# Altium PCB ublox_gnss_node.PcbDoc (part 1 of 5)
Units mm, origin at the board's own origin, x right, y up, seen from the top; angles counter-clockwise.
Board outline 84 x 108.04 mm, 6 copper layers (Top Layer (HSig), L2 GND, L3 Signal X, L4 PWR, L5 GND, Bottom Layer (Y)), stack 1.538 mm thick; 222 components, 159 nets, 892 pads, 1025 vias.
Unrouted connection lines stored in the file: 345.
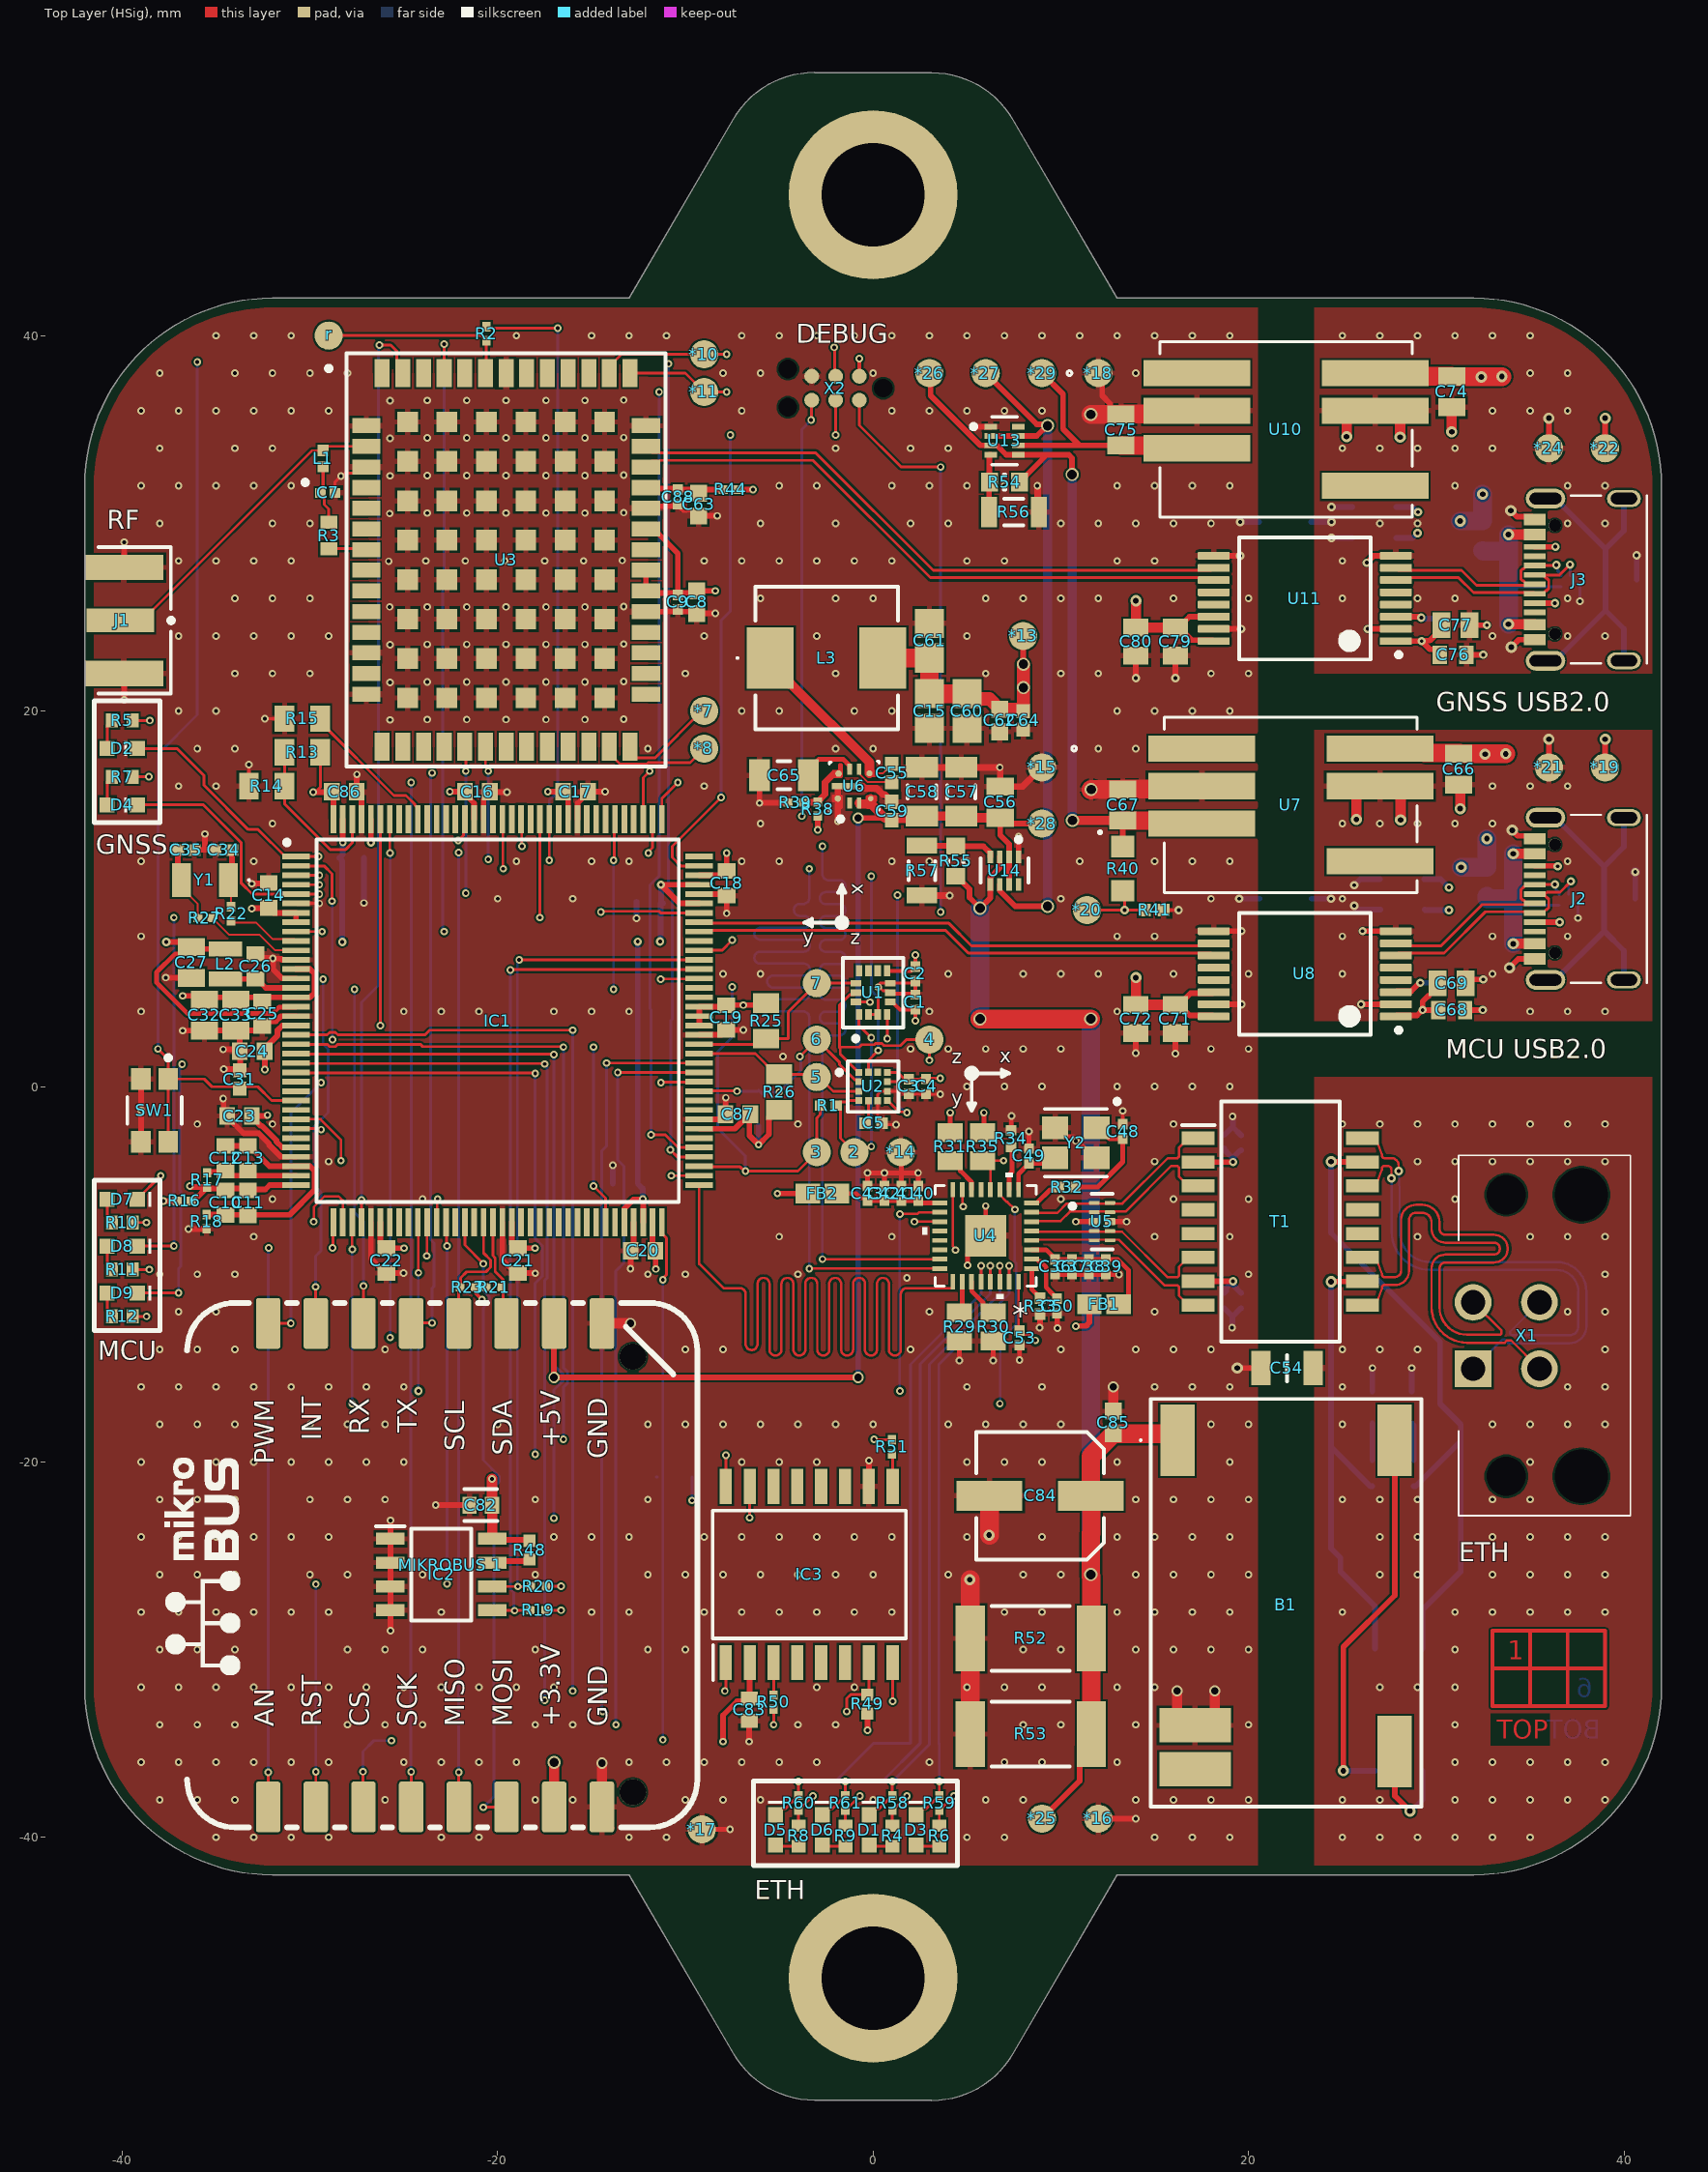
[diagram p0: Top Layer (HSig) view]
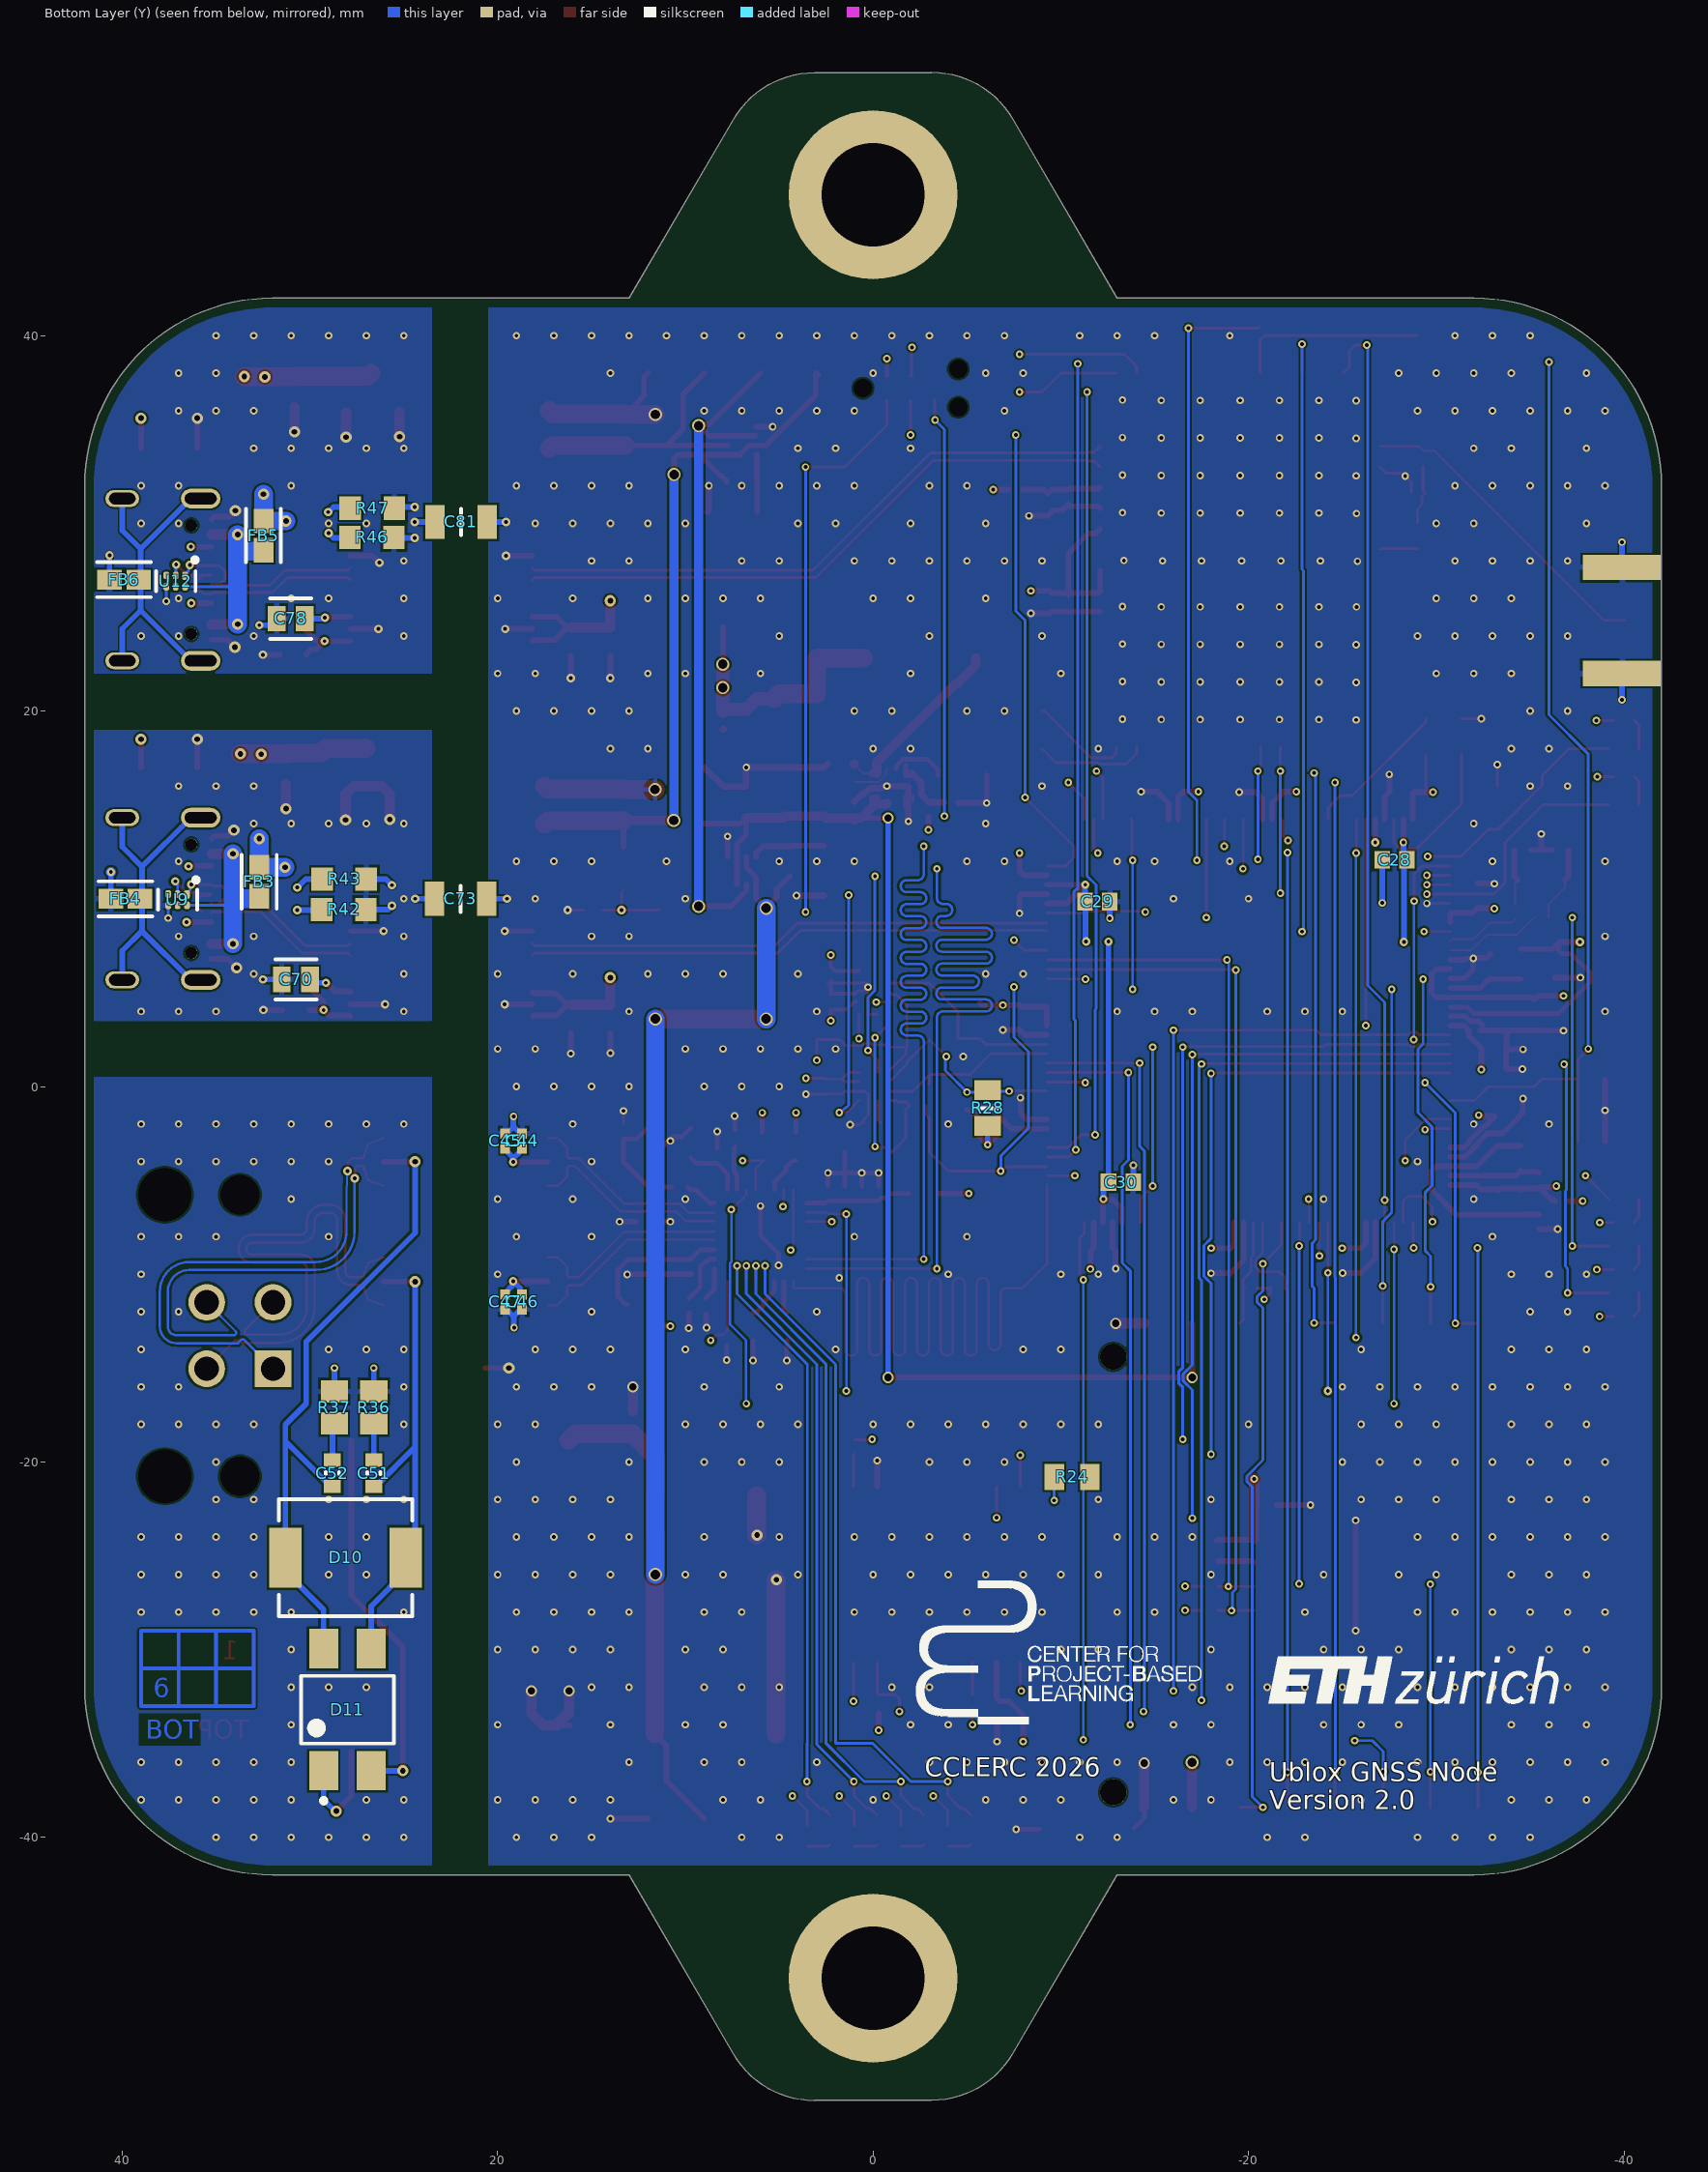
[diagram p1: Bottom Layer (Y) view, seen from below]
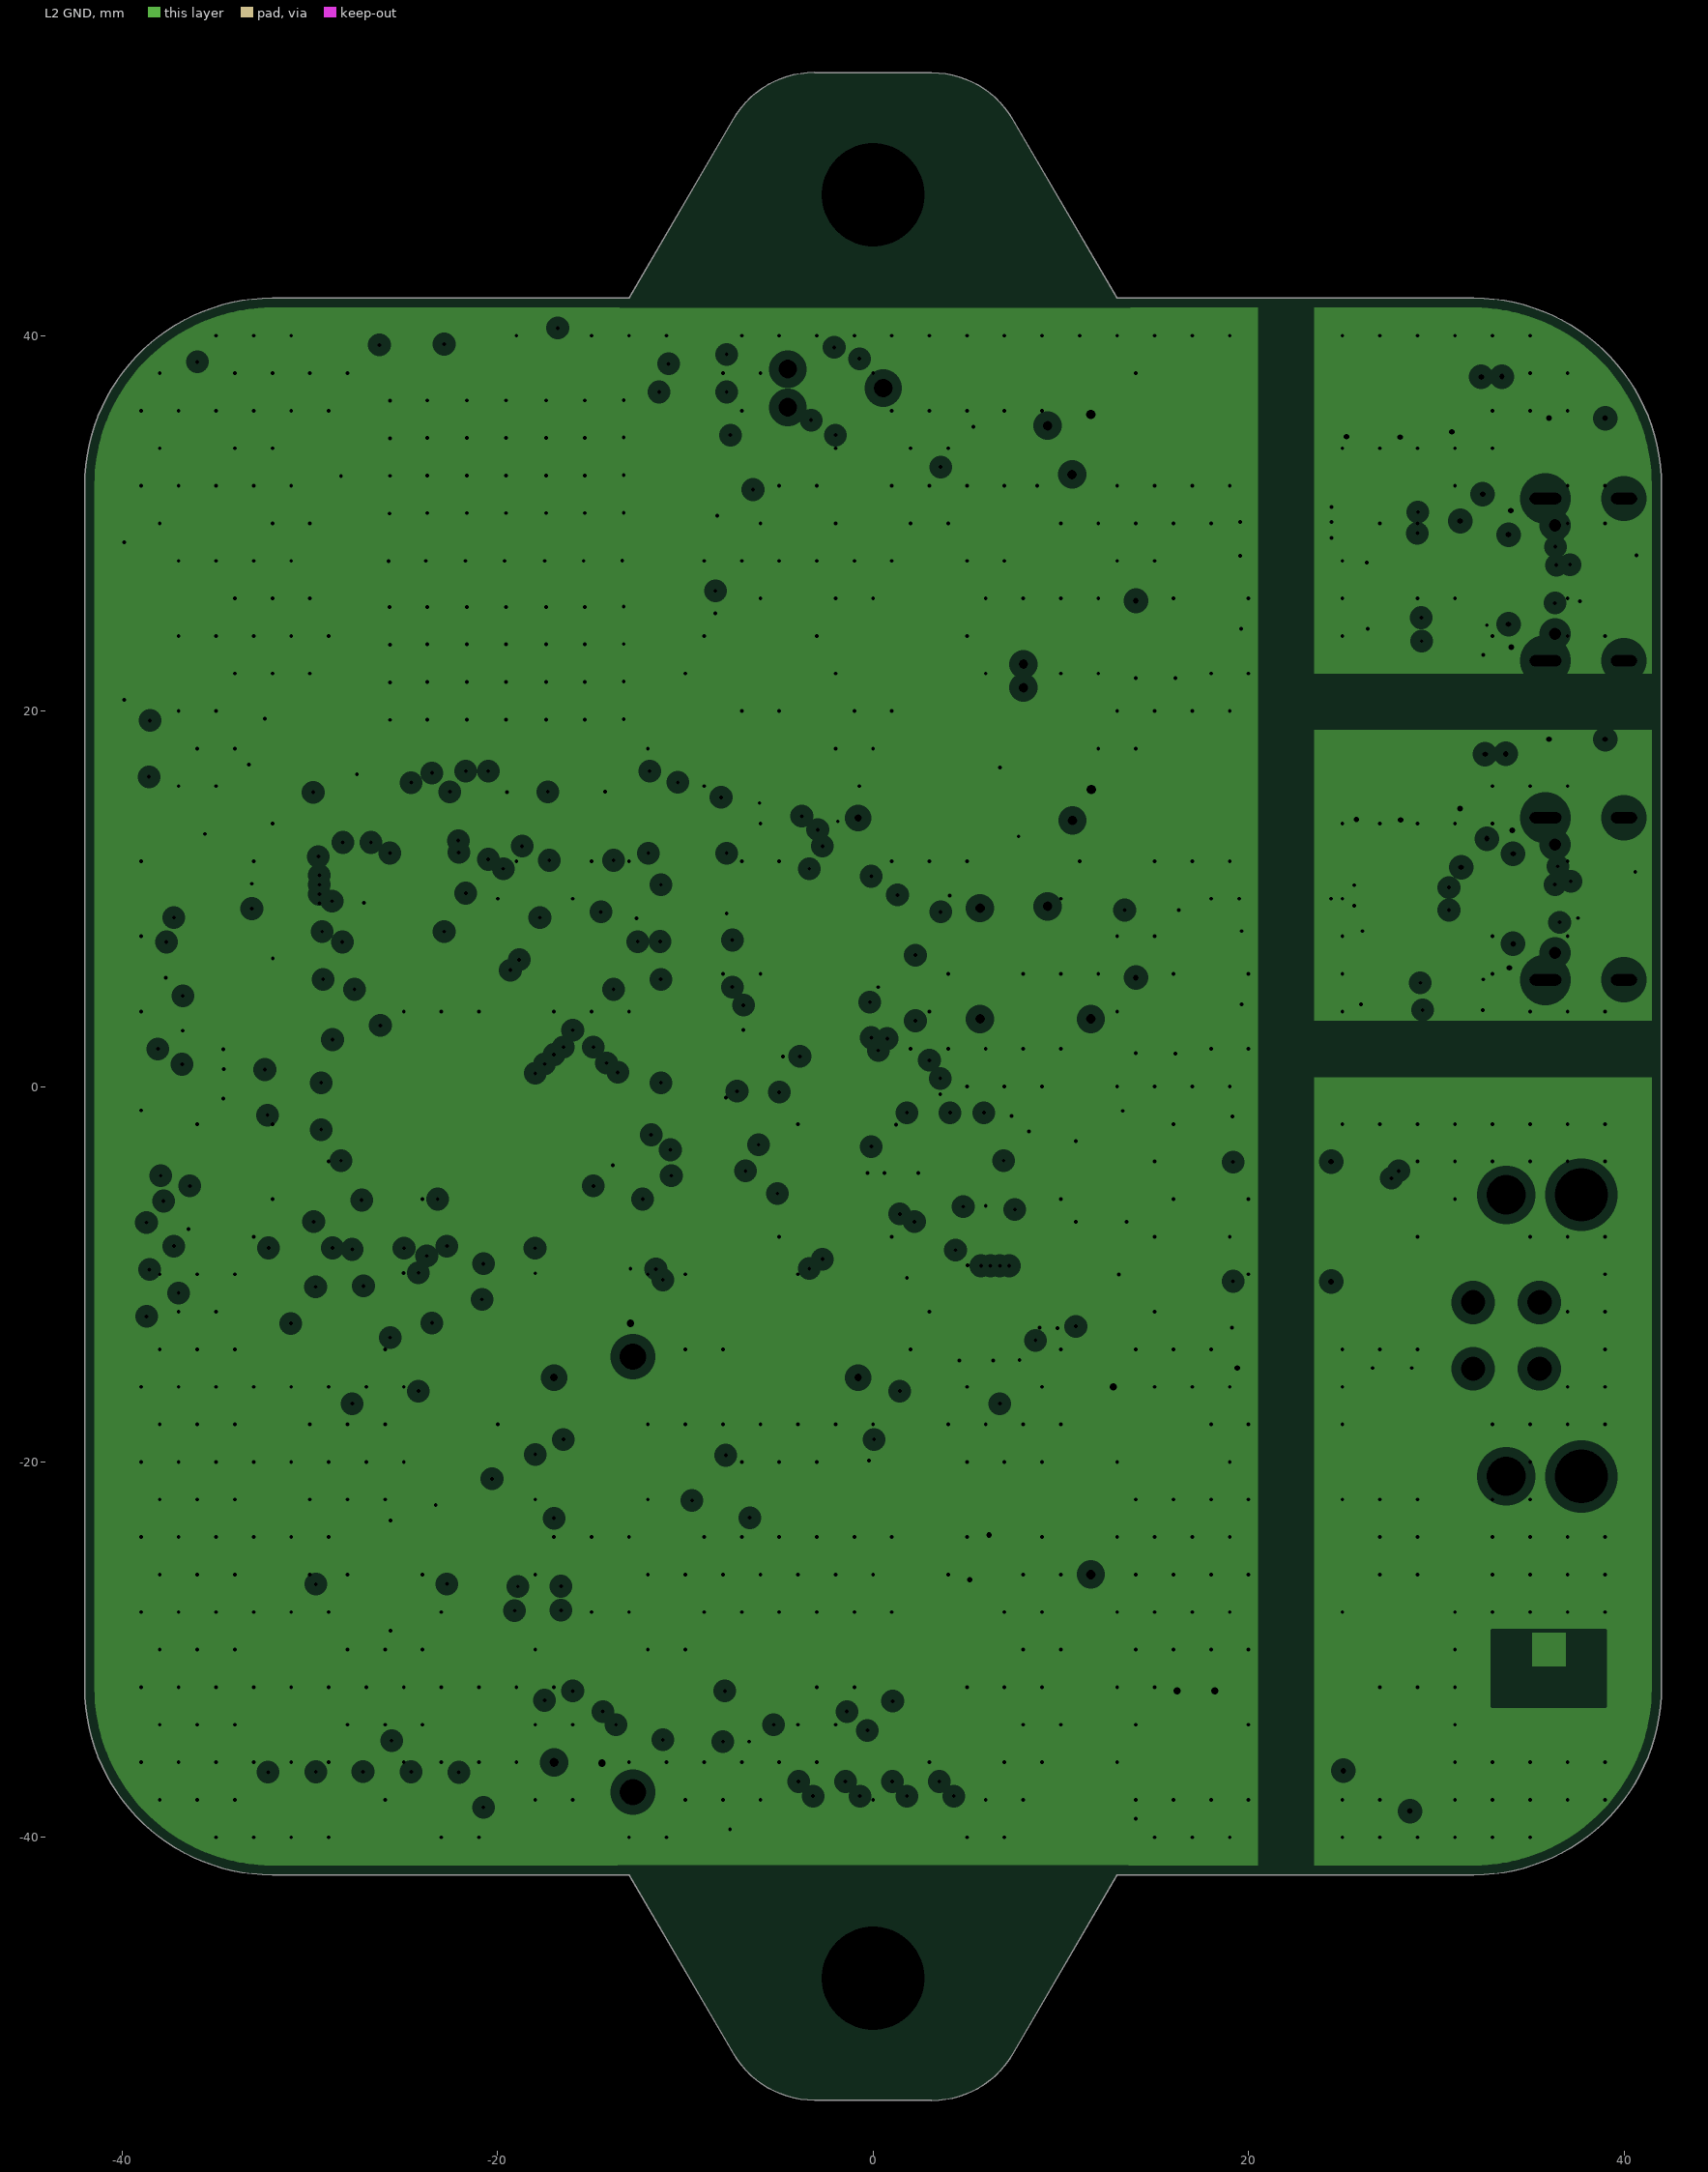
[diagram p2: L2 GND, clearances drawn from the general rule]
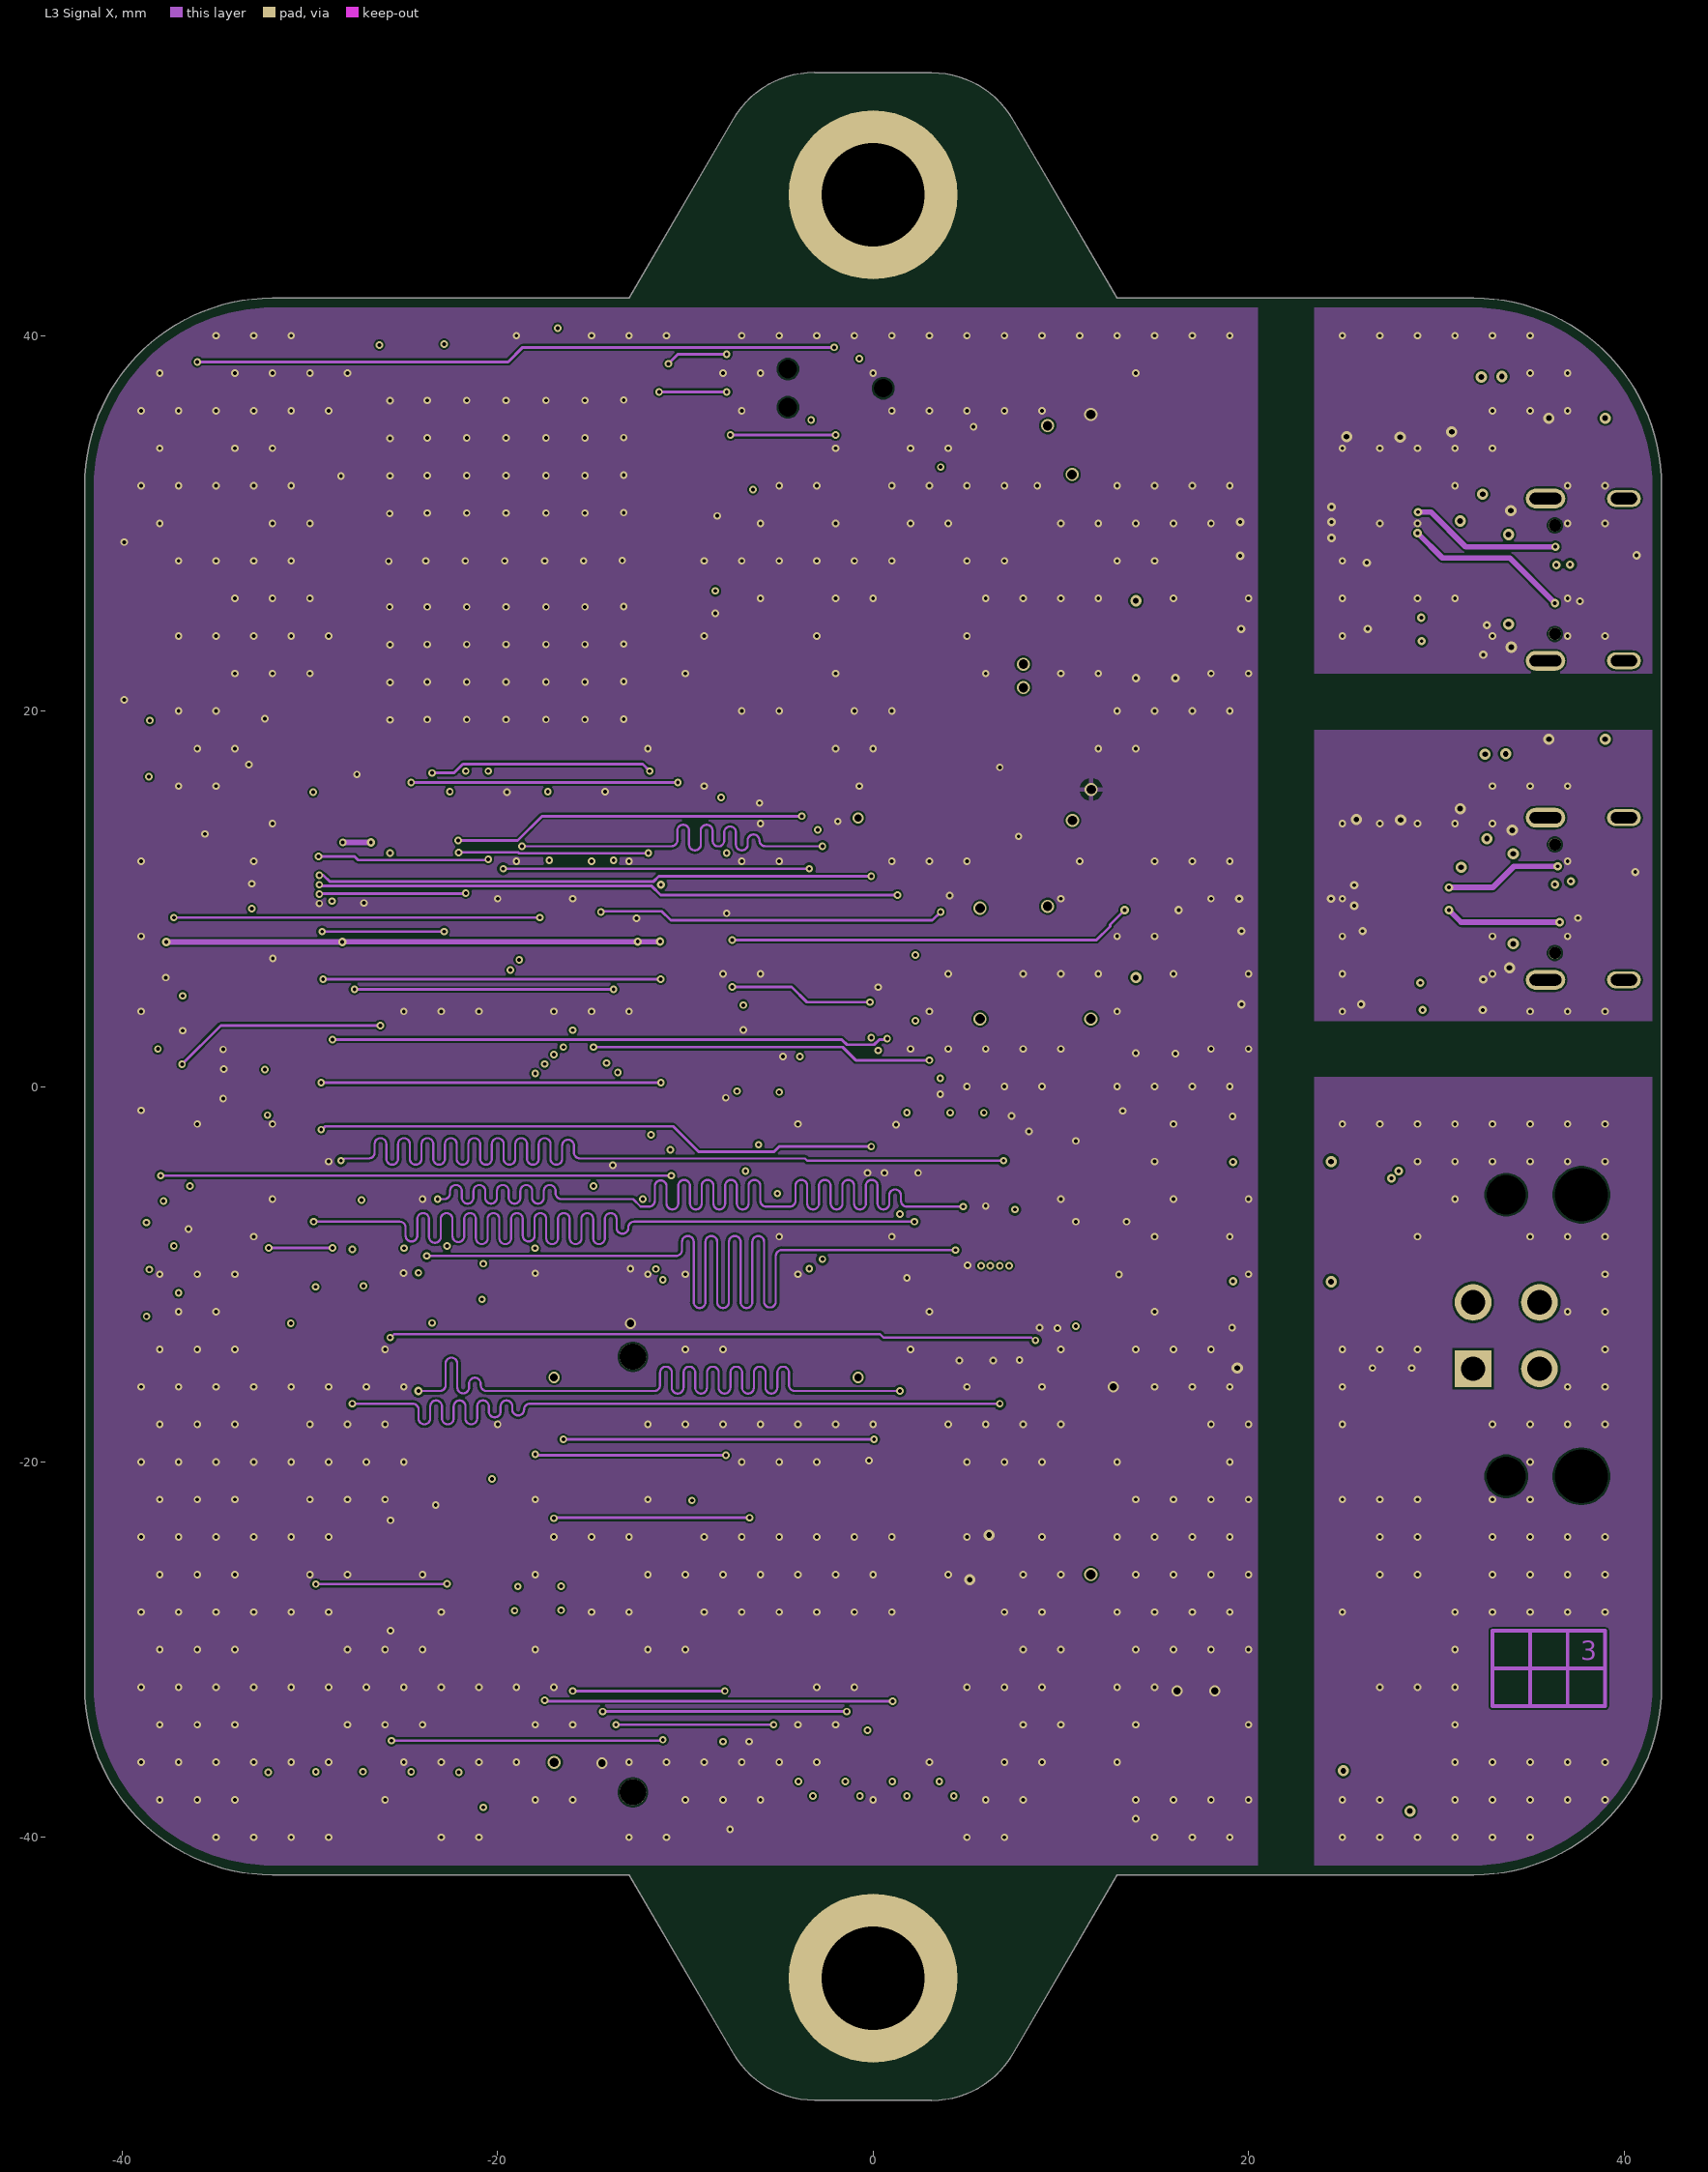
[diagram p3: L3 Signal X]
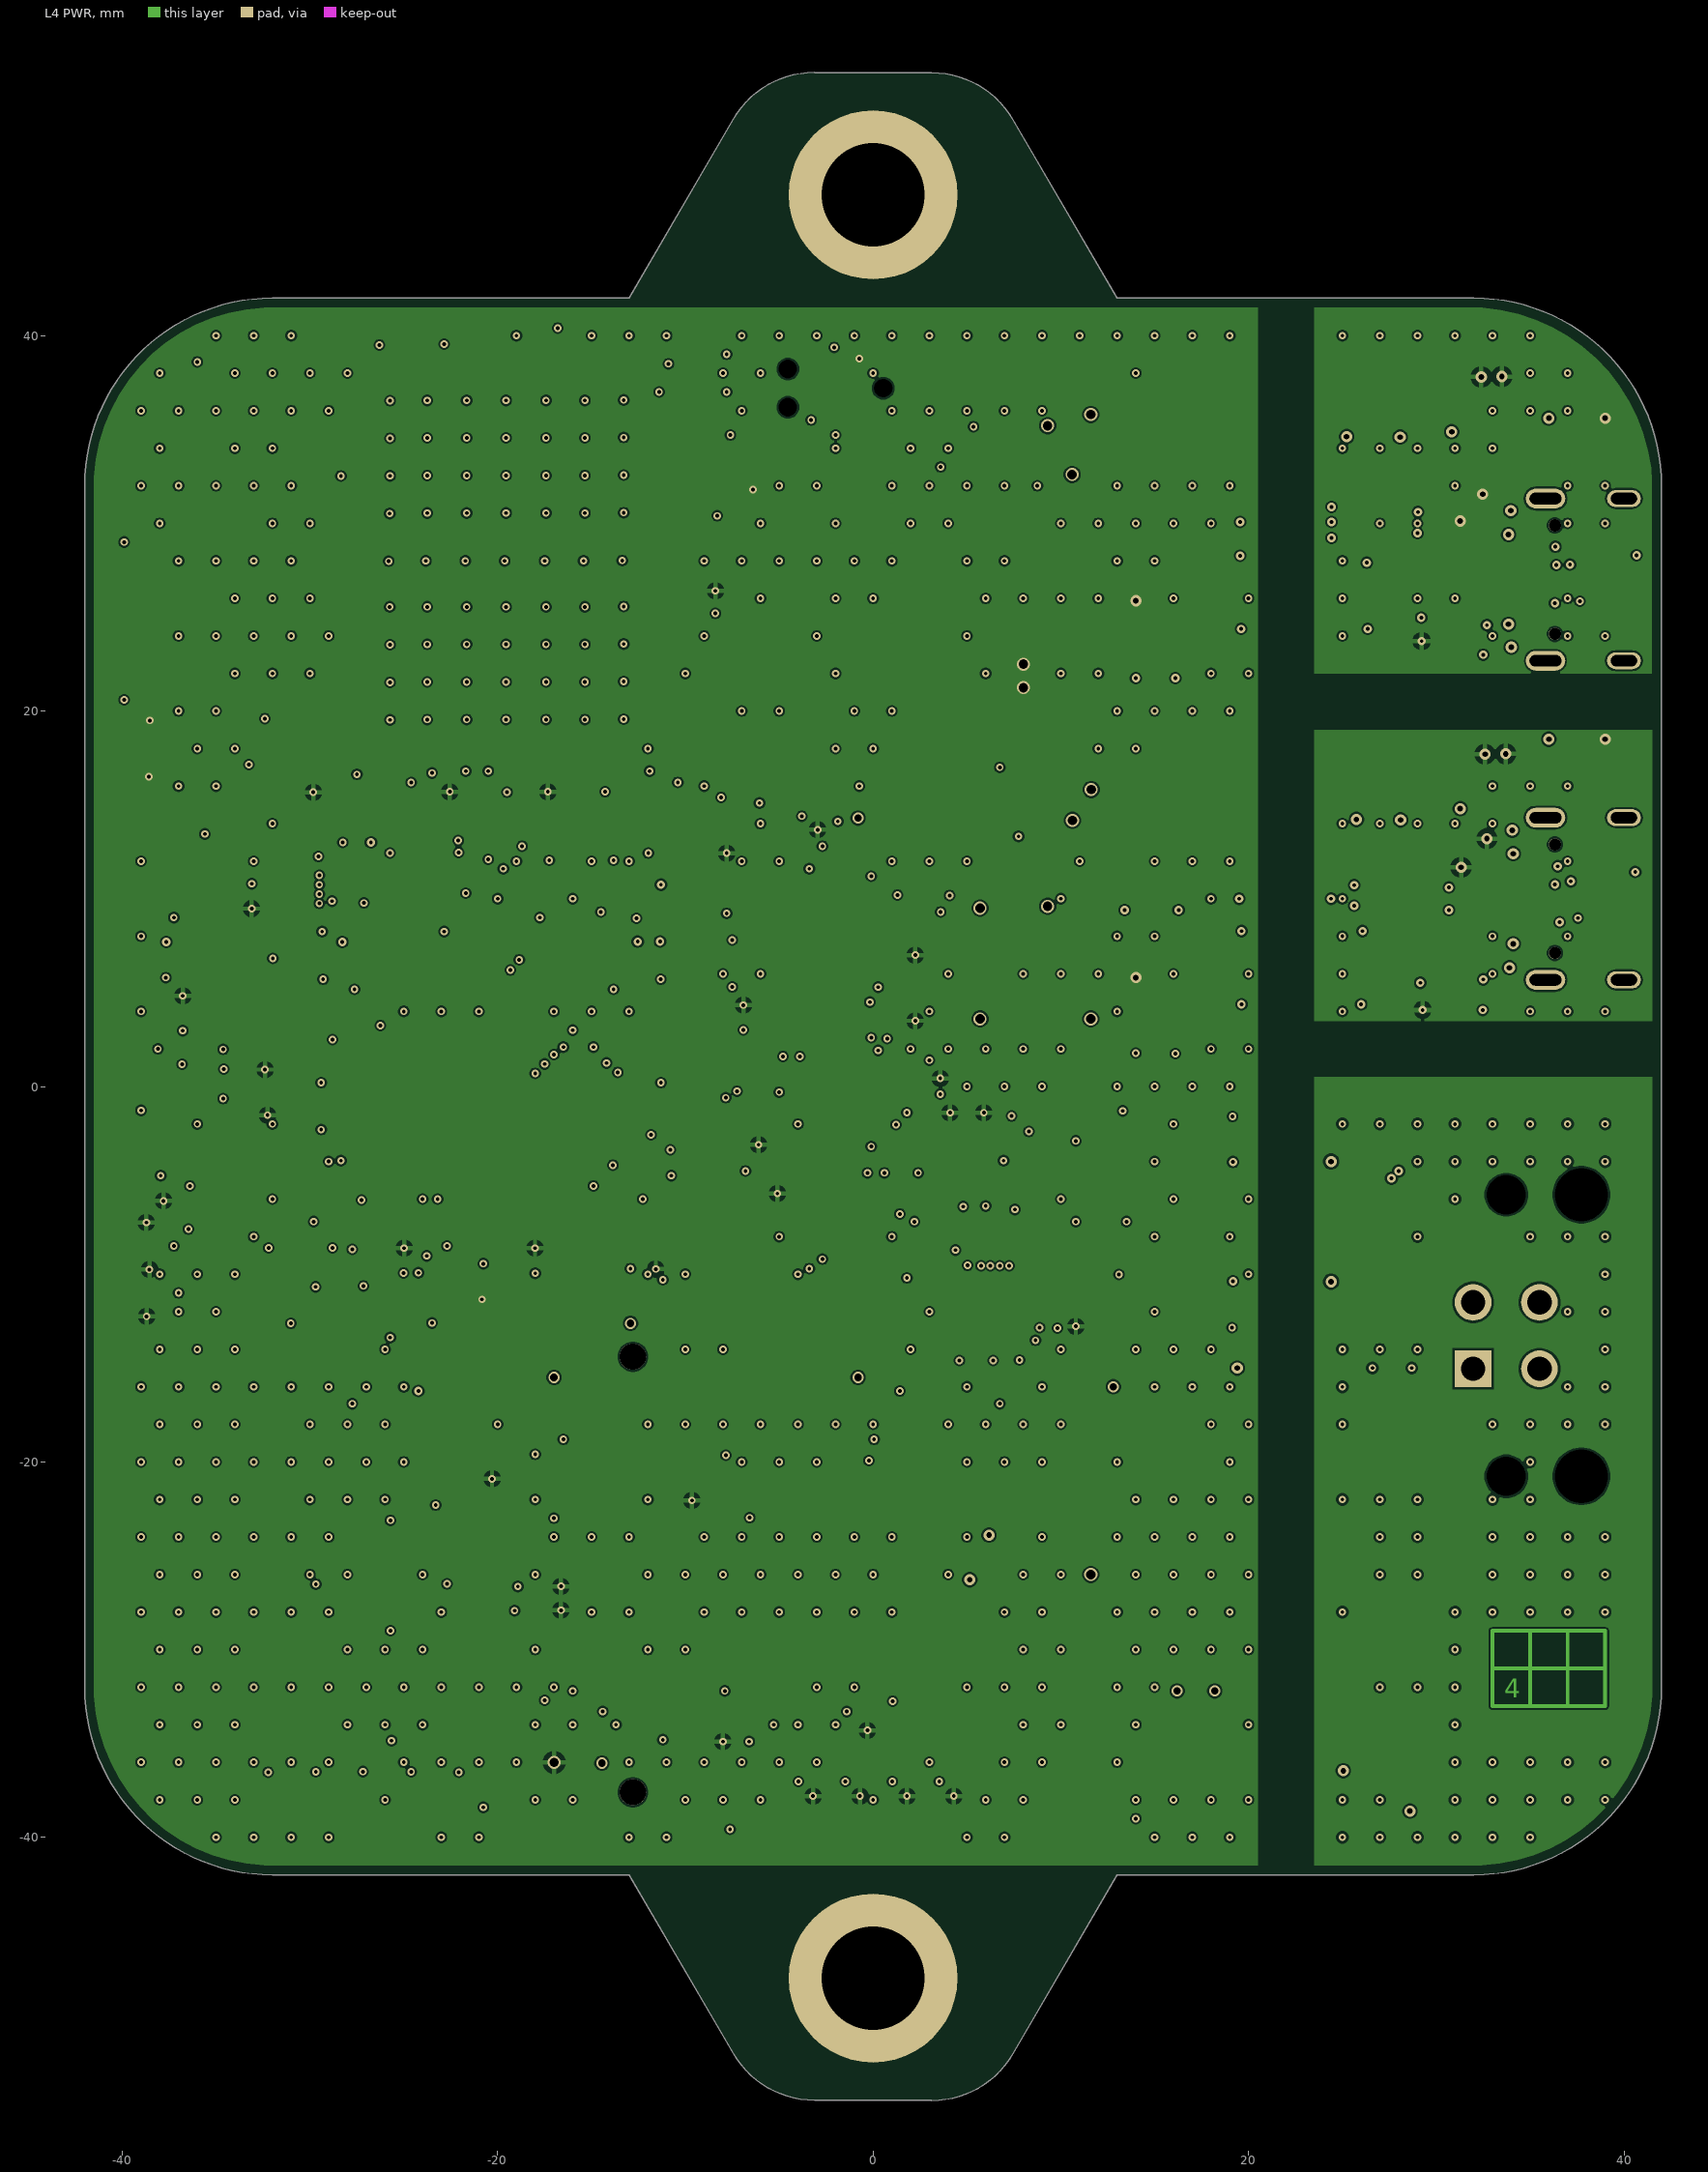
[diagram p4: L4 PWR]
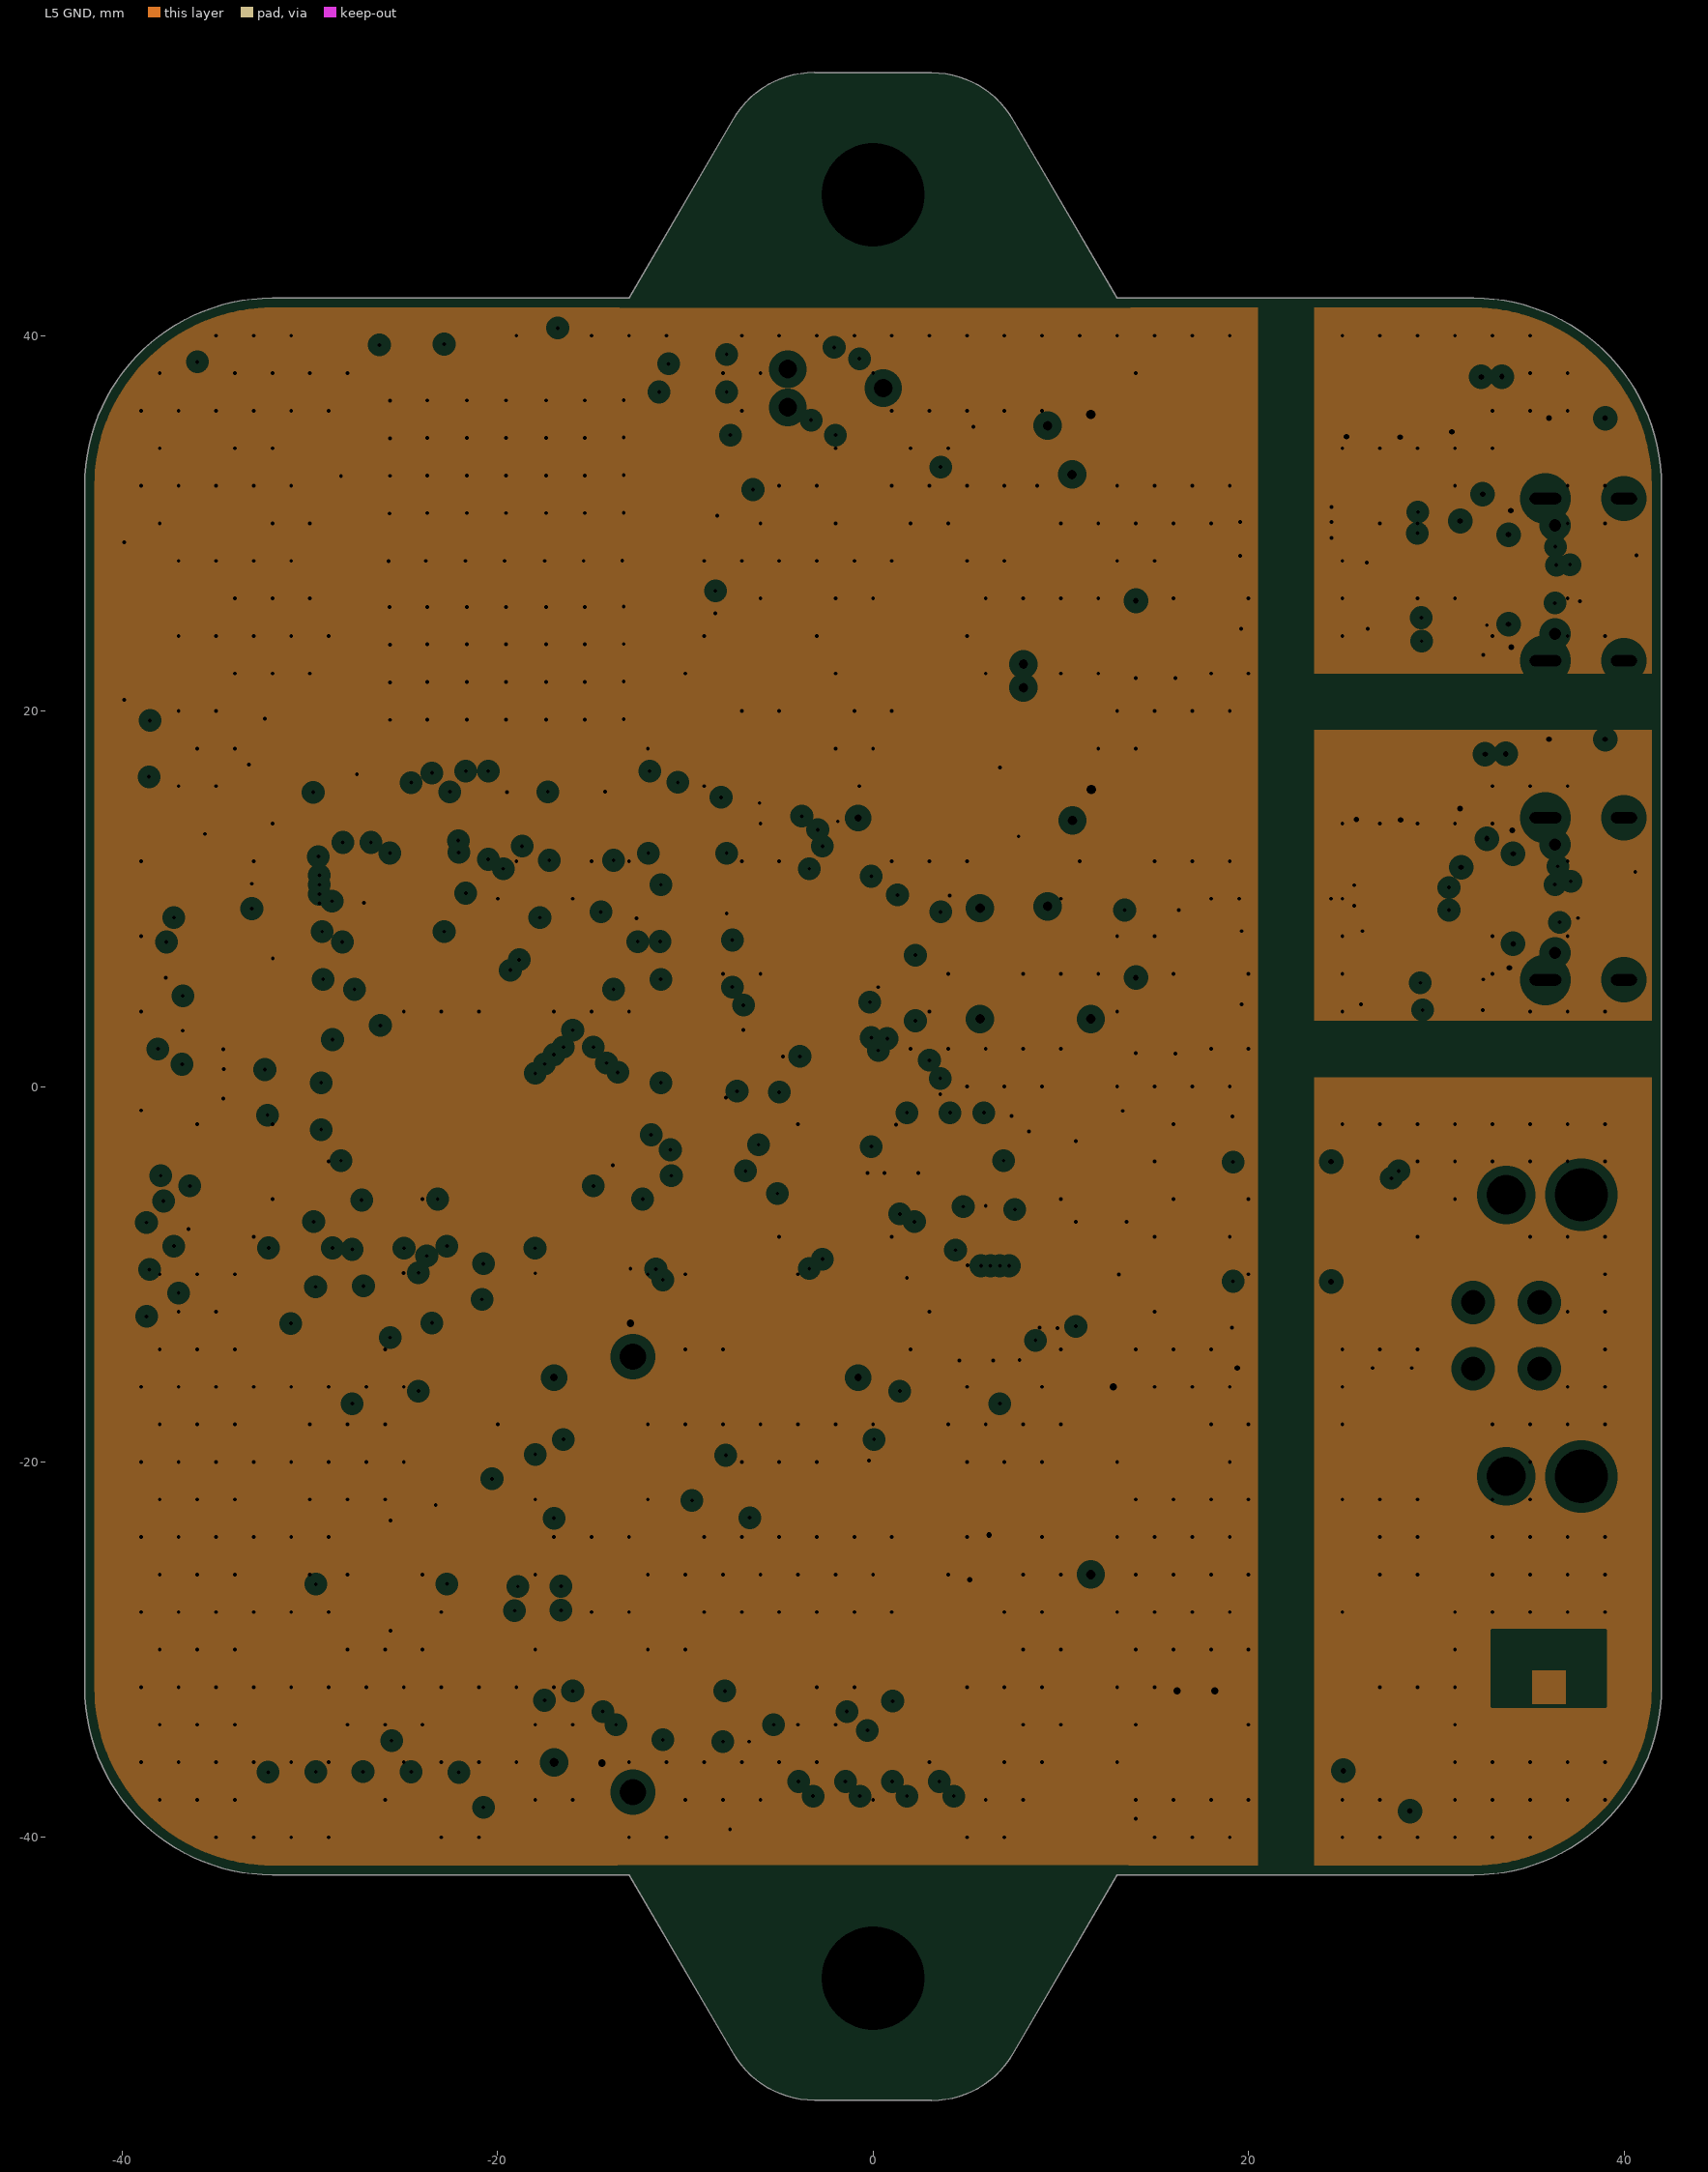
[diagram p5: L5 GND, clearances drawn from the general rule]
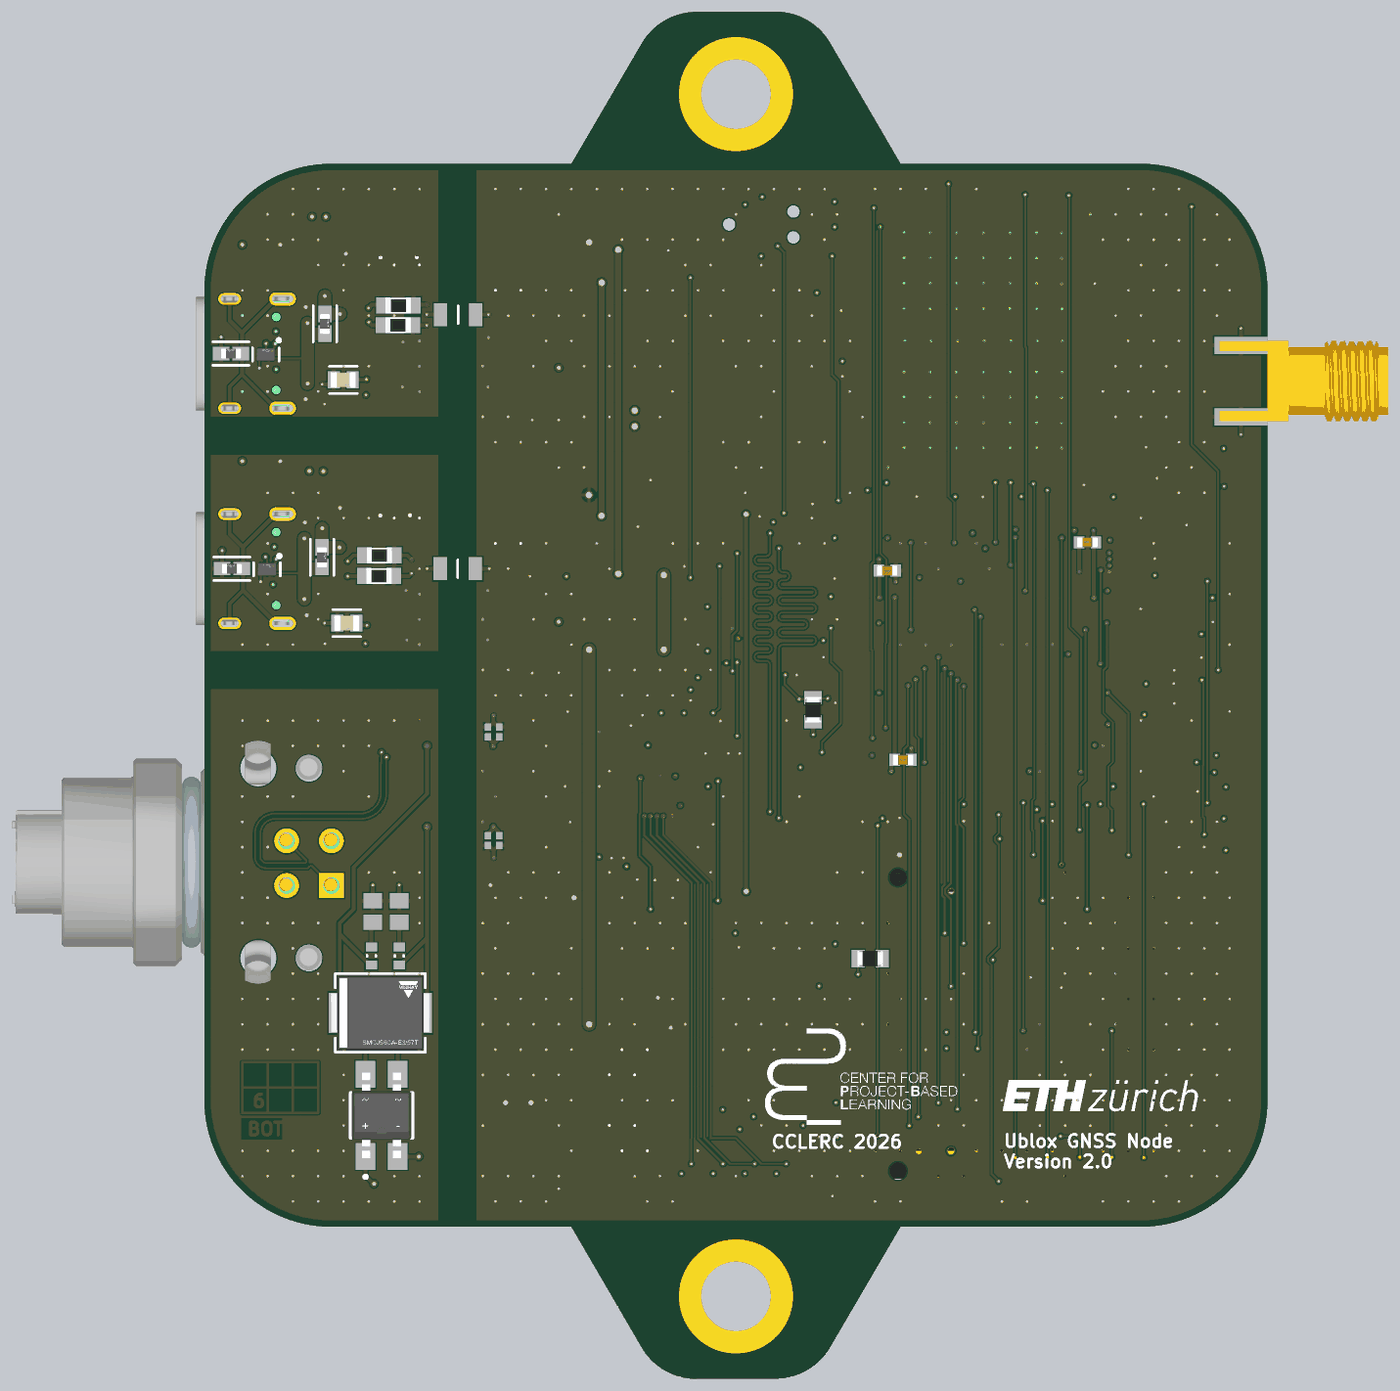
[diagram p9: 3D render of the assembled board from below, using the file's embedded part models]

## Layer stack, top to bottom
Top Solder: solder mask 0.0305, SM-002, Dk 3.8
Top Layer (HSig): signal copper 0.035
Prepreg 1: prepreg 0.0994, 3313*1, Dk 4.1
L2 GND: plane copper 0.0152, net (Multiple Nets)
Core 1: core 0.55, Core, Dk 4.6
L3 Signal X: signal copper 0.0152
Prepreg 2: prepreg 0.1088, 2116*1, Dk 4.16
L4 PWR: signal copper 0.0152
Core 2: core 0.55, Core, Dk 4.6
L5 GND: plane copper 0.0152, net (Multiple Nets)
Prepreg 3: prepreg 0.0994, 3313*1, Dk 4.1
Bottom Layer (Y): signal copper 0.035
Bottom Solder: solder mask 0.0305, SM-002, Dk 3.8

## Board outline
-32,-42 -13,-42 -7.454,-51.496 ccw(c-3.123,-48.996) -3.123,-53.996 -3.123,-54 3.123,-54 3.123,-54.021 ccw(c3.123,-49.021) 7.454,-51.521 13,-42 32,-42 ccw(c32,-32) 42,-32 42,32 ccw(c32,32) 32,42 13,42 7.454,51.496 ccw(c3.123,48.996) 3.123,53.996 3.123,54 -3.123,54 -3.123,54.021 ccw(c-3.123,49.021) -7.454,51.521 -13,42 -32,42 ccw(c-32,32) -42,32 -42,-32 ccw(c-32,-32)

## Design rules (kind name [scope] priority, off if disabled: settings)
BoardOutlineClearance Silk [OnLayer('Top Overlay')] p1: gap=0.2 ignorepadtopadclearanceinfootprint=FALSE
BoardOutlineClearance "Allow FP-SMA-J-P-H-ST-EM1-MFG" [HasFootprint('FP-SMA-J-P-H-ST-EM1-MFG')] p2: gap=0 ignorepadtopadclearanceinfootprint=FALSE
BoardOutlineClearance [All] p3: gap=0.5 ignorepadtopadclearanceinfootprint=FALSE
Clearance "Distance to GND" [(InNetClass('ETH_100R') OR InNetClass('ETH_isolated')) or InNetClass('USB_90R') or InNetClass('50RNetsClass') or InNetClass('USB_90R_isolated') or InNetClass('SE_50R') vs (InNet('GND') or InNet('GND_ETH') or InNet('GND_BP2') or InNet('GND_BP')) and InPolygon] p1: gap=0.127 ignorepadtopadclearanceinfootprint=FALSE
Clearance "Stitching GND" [IsStitchingVia and InNet('GND') vs (IsVia and (Not IsStitchingVia)) Or IsPad] p2: gap=0.5 ignorepadtopadclearanceinfootprint=FALSE
Clearance [All] p3: gap=0.1 ignorepadtopadclearanceinfootprint=FALSE
DiffPairsRouting USB1 [InDifferentialPairClass('USB_90R')] p1: maxlimit=0.237 minlimit=0.127 mostfreqgap=0.237 toplayer_mingap=0.237 toplayer_minwidth=0.15 toplayer_maxwidth=0.15 toplayer_prefwidth=0.15 midlayer1_maxgap=0.127 midlayer1_prefgap=0.127 midlayer1_minwidth=0.104 midlayer1_maxwidth=0.104 midlayer1_prefwidth=0.104 midlayer2_maxgap=0.127 midlayer2_prefgap=0.127 midlayer2_minwidth=0.104 midlayer2_maxwidth=0.104 midlayer2_prefwidth=0.104 bottomlayer_mingap=0.237 bottomlayer_minwidth=0.15 bottomlayer_maxwidth=0.15 bottomlayer_prefwidth=0.15 impedanceprofiledriven=TRUE impedanceprofileid={FCFEE26E-A48C-4261-8A8F-EDA6C5E4AE91} impedanceprofilevalue=90.000000 maxuncoupledlength=12.7
DiffPairsRouting USB2 [InDifferentialPairClass('USB_90R_isolated')] p2: maxlimit=0.237 minlimit=0.127 mostfreqgap=0.237 toplayer_mingap=0.237 toplayer_minwidth=0.15 toplayer_maxwidth=0.15 toplayer_prefwidth=0.15 midlayer1_maxgap=0.127 midlayer1_prefgap=0.127 midlayer1_minwidth=0.104 midlayer1_maxwidth=0.104 midlayer1_prefwidth=0.104 midlayer2_maxgap=0.127 midlayer2_prefgap=0.127 midlayer2_minwidth=0.104 midlayer2_maxwidth=0.104 midlayer2_prefwidth=0.104 bottomlayer_mingap=0.237 bottomlayer_minwidth=0.15 bottomlayer_maxwidth=0.15 bottomlayer_prefwidth=0.15 impedanceprofiledriven=TRUE impedanceprofileid={FCFEE26E-A48C-4261-8A8F-EDA6C5E4AE91} impedanceprofilevalue=90.000000 maxuncoupledlength=12.7
DiffPairsRouting ETH1 [InDifferentialPairClass('ETH_100R')] p3: maxlimit=0.3 minlimit=0.127 mostfreqgap=0.3 toplayer_mingap=0.3 toplayer_minwidth=0.124 toplayer_maxwidth=0.124 toplayer_prefwidth=0.124 midlayer1_maxgap=0.127 midlayer1_prefgap=0.127 midlayer1_minwidth=0.077 midlayer1_maxwidth=0.077 midlayer1_prefwidth=0.077 midlayer2_maxgap=0.127 midlayer2_prefgap=0.127 midlayer2_minwidth=0.077 midlayer2_maxwidth=0.077 midlayer2_prefwidth=0.077 bottomlayer_mingap=0.3 bottomlayer_minwidth=0.124 bottomlayer_maxwidth=0.124 bottomlayer_prefwidth=0.124 impedanceprofiledriven=TRUE impedanceprofileid={096024E8-5D82-4837-9073-35372FF524E7} impedanceprofilevalue=100.000000 maxuncoupledlength=12.7
DiffPairsRouting ETH2 [InDifferentialPairClass('ETH_100R_isolated')] p4: maxlimit=0.3 minlimit=0.127 mostfreqgap=0.3 toplayer_mingap=0.3 toplayer_minwidth=0.124 toplayer_maxwidth=0.124 toplayer_prefwidth=0.124 midlayer1_maxgap=0.127 midlayer1_prefgap=0.127 midlayer1_minwidth=0.077 midlayer1_maxwidth=0.077 midlayer1_prefwidth=0.077 midlayer2_maxgap=0.127 midlayer2_prefgap=0.127 midlayer2_minwidth=0.077 midlayer2_maxwidth=0.077 midlayer2_prefwidth=0.077 bottomlayer_mingap=0.3 bottomlayer_minwidth=0.124 bottomlayer_maxwidth=0.124 bottomlayer_prefwidth=0.124 impedanceprofiledriven=TRUE impedanceprofileid={096024E8-5D82-4837-9073-35372FF524E7} impedanceprofilevalue=100.000000 maxuncoupledlength=12.7
HoleSize [All] p1: absolutevalues=TRUE maxlimit=6.3 minlimit=0.15 maxpercent=80.000 minpercent=20.000
MatchedLengths "Schematic Matched Net Lengths_4" [InDifferentialPair('USB_ISOLATED_D')] p1: tolerance=2.54 checknetsindiffpair=FALSE checkdiffpairvsdiffpair=TRUE checkxsignals=TRUE checkothers=TRUE usedelayunits=TRUE delaytolerance=10.000000
MatchedLengths "Schematic Matched Net Lengths_3" [InDifferentialPair('USB_D')] p2: tolerance=2.54 checknetsindiffpair=FALSE checkdiffpairvsdiffpair=TRUE checkxsignals=TRUE checkothers=TRUE usedelayunits=TRUE delaytolerance=10.000000
MatchedLengths MatchedLengths_1 [InDifferentialPair('USB_ISOLATED_GNSS_D')] p3: tolerance=25.4 checknetsindiffpair=FALSE checkdiffpairvsdiffpair=TRUE checkxsignals=TRUE checkothers=TRUE usedelayunits=TRUE delaytolerance=10.000000
MatchedLengths [InDifferentialPair('USB_MCU_D')] p4: tolerance=25.4 checknetsindiffpair=FALSE checkdiffpairvsdiffpair=TRUE checkxsignals=TRUE checkothers=TRUE usedelayunits=TRUE delaytolerance=10.000000
MatchedLengths "Schematic Matched Net Lengths_1" [InNetClass('ETH_100R')] p5: tolerance=2.54 checknetsindiffpair=FALSE checkdiffpairvsdiffpair=TRUE checkxsignals=TRUE checkothers=TRUE usedelayunits=TRUE delaytolerance=10.000000
MatchedLengths "ETH to MCU" [InNetClass('50RNetsClass')] p6: tolerance=25.4 checknetsindiffpair=FALSE checkdiffpairvsdiffpair=TRUE checkxsignals=TRUE checkothers=TRUE usedelayunits=TRUE delaytolerance=5.000000
MatchedLengths "Schematic Matched Net Lengths_5" [InDifferentialPairClass('ETH_100R_isolated')] p7: tolerance=2.54 checknetsindiffpair=FALSE checkdiffpairvsdiffpair=TRUE checkxsignals=TRUE checkothers=TRUE usedelayunits=TRUE delaytolerance=10.000000
MinimumSolderMaskSliver [All] p1: minsoldermaskwidth=0.1
PlaneClearance [All] p1: clearance=0.508
PlaneConnect [All] p1: pad.planeconnectstyle=Relief pad.reliefexpansion=0.3 pad.reliefentries=4 pad.reliefconductorwidth=0.3 pad.reliefairgap=0.2 via.planeconnectstyle=Direct via.reliefexpansion=0.508 via.reliefentries=4 via.reliefconductorwidth=0.254 via.reliefairgap=0.254
PolygonConnect [All] p1: thpad.connectstyle=Relief thpad.reliefconductorwidth=0.3 thpad.reliefentries=4 thpad.polygonreliefangle="90 Angle" thpad.airgapwidth=0.125 smdpad.connectstyle=Relief smdpad.reliefconductorwidth=0.3 smdpad.reliefentries=4 smdpad.polygonreliefangle="90 Angle" smdpad.airgapwidth=0.125 via.connectstyle=Direct via.reliefconductorwidth=0.254 via.reliefentries=4 via.polygonreliefangle="90 Angle" via.airgapwidth=0.254
RoutingVias [All] p1: holewidth=0.3 width=0.6 viastyle="Through Hole" minholewidth=0.2 minwidth=0.4 maxholewidth=0.711 maxwidth=1.27
SilkToSilkClearance [All] p1: silktosilkclearance=0.15
SilkToSolderMaskClearance [IsPad] p1: minsilkscreentomaskgap=0.15 clearancetoexposedcopper=TRUE
SolderMaskExpansion SolderMaskExpansion_1 [IsVia AND NOT IsComponentVia] p1: expansion=0.102 istentingtop=TRUE
SolderMaskExpansion [All] p2: expansion=0 istentingtop=FALSE
SupplyNets "Schematic Supply Nets_29" [InNet('GND_BP')] p1: voltage=0.000
SupplyNets "Schematic Supply Nets_28" [InNet('+5V_USB')] p2: voltage=0.000
SupplyNets "Schematic Supply Nets_27" [InNet('GND_BP2')] p3: voltage=0.000
SupplyNets "Schematic Supply Nets_26" [InNet('+5V_POE')] p4: voltage=0.000
SupplyNets "Schematic Supply Nets_25" [InNet('+5V_USB_GNSS')] p5: voltage=0.000
SupplyNets "Schematic Supply Nets_24" [InNet('AGND')] p6: voltage=0.000
SupplyNets "Schematic Supply Nets_23" [InNet('VBUS_MCU')] p7: voltage=0.000
SupplyNets "Schematic Supply Nets_22" [InNet('+3V3')] p8: voltage=0.000
SupplyNets "Schematic Supply Nets_21" [InNet('VBUS_GNSS')] p9: voltage=0.000
SupplyNets "Schematic Supply Nets_20" [InNet('+5V_USB_MCU')] p10: voltage=0.000
SupplyNets "Schematic Supply Nets_19" [InNet('VCAP')] p11: voltage=0.000
SupplyNets "Schematic Supply Nets_18" [InNet('POE_TX')] p12: voltage=0.000
SupplyNets "Schematic Supply Nets_17" [InNet('POE_RX')] p13: voltage=0.000
SupplyNets "Schematic Supply Nets_16" [InNet('GND')] p14: voltage=0.000
SupplyNets "Schematic Supply Nets_15" [InNet('+5V')] p15: voltage=0.000
Width 50R [InNetClass('50RNetsClass')] p1: maxlimit=0.128 minlimit=0.117 preferedwidth=0.128 toplayer_minwidth=0.128 midlayer1_maxwidth=0.117 midlayer1_prefwidth=0.117 midlayer2_maxwidth=0.117 midlayer2_prefwidth=0.117 bottomlayer_minwidth=0.128 impedanceprofiledriven=TRUE impedanceprofileid={D280376C-EC7A-454D-939E-5EE7E1E36281} impedanceprofilevalue=50.000000 minimp=50.000000 maximp=50.000000 favimp=50.000000
Width "Antenna 50R" [InNetClass('SE_50R')] p2: maxlimit=0.128 minlimit=0.117 preferedwidth=0.128 toplayer_minwidth=0.128 midlayer1_maxwidth=0.117 midlayer1_prefwidth=0.117 midlayer2_maxwidth=0.117 midlayer2_prefwidth=0.117 bottomlayer_minwidth=0.128 impedanceprofiledriven=TRUE impedanceprofileid={D280376C-EC7A-454D-939E-5EE7E1E36281} impedanceprofilevalue=50.000000 minimp=50.000000 maximp=50.000000 favimp=50.000000
Width [All] p3: maxlimit=1 minlimit=0.1 preferedwidth=0.3
23 further rules are at their usual default settings.

## Classes and differential pairs
differential pair class USB_90R_isolated: USB_ISOLATED_D USB_ISOLATED_GNSS_D
differential pair class USB_90R: USB_D USB_MCU_D
differential pair class ETH_100R_isolated: RX TX
differential pair class ETH_100R: PMD_RD PMD_TD
net class USB_isolated: NetC70_1 NetC78_1 NetU8_4 NetU8_5 NetU9_3 NetU9_5 NetU11_4 NetU11_5 NetU12_3 NetU12_5 VBUS_GNSS VBUS_MCU
net class USB_90R_isolated: USB_ISOLATED_D_N USB_ISOLATED_D_P USB_ISOLATED_GNSS_D_N USB_ISOLATED_GNSS_D_P
net class USB_90R: USB_D_N USB_D_P USB_MCU_D_N USB_MCU_D_P
net class SE_50R: RF_IN
net class ETH_isolated: GND_ETH POE_RX POE_TX RX_N RX_P TX_N TX_P
net class ETH_100R: PMD_RD_N PMD_RD_P PMD_TD_N PMD_TD_P
net class ETH: PMD_RD_N PMD_RD_P PMD_TD_N PMD_TD_P
net class D90: USB_D_N USB_D_P USB_MCU_D_N USB_MCU_D_P
net class 50RNetsClass: ETH_CRS_DV ETH_MDC ETH_MDIO ETH_REF_CLK ETH_RST ETH_RXD0 ETH_RXD1 ETH_TX_EN ETH_TXD0 ETH_TXD1
component class U_USB_C_MCU: *19 *20 *21 C66 C67 C68 C69 C70 C71 C72 C73 FB3 FB4 J2 R40 R41 R42 R43 U7 U8 U9
component class U_USB_C_GNSS: *22 *24 C74 C75 C76 C77 C78 C79 C80 C81 FB5 FB6 J3 R46 R47 U10 U11 U12
component class U_SENS_MEMS: 2 3 4 5 6 7 C1 C2 C3 C4 C5 R1 U1 U2
component class U_POE_PMUX: *25 *26 *27 *28 *29 B1 C84 C85 D10 D11 R52 R53 R54 R55 R56 R57 U13 U14
component class U_Mikro_Bus: "MIKROBUS 1"
component class U_Memory: C82 C83 IC2 IC3 R48 R49 R50 R51
component class U_MCU: C10 C11 C12 C13 C14 C16 C17 C18 C19 C20 C21 C22 C23 C24 C25 C26 C27 C28 C29 C30 C31 C32 C33 C34 C35 C86 C87 IC1 L2 R13 R14 R15 R16 R17 R18 R19 R20 R21 R22 R23 R24 R25 R26 R27 R28 SW1 X2 Y1
component class U_IndicatorLEDs: D1 D2 D3 D4 D5 D6 D7 D8 D9 R4 R5 R6 R7 R8 R9 R10 R11 R12 R58 R59 R60 R61
component class U_GNSS_ZED-X20P: *7 *8 *10 *11 C7 C8 C9 C63 C88 J1 L1 r R2 R3 R44 U3
component class U_ETH: C36 C37 C38 C39 C40 C41 C42 C43 C44 C45 C46 C47 C48 C49 C50 C51 C52 C53 C54 FB1 FB2 R29 R30 R31 R32 R33 R34 R35 R36 R37 T1 U4 U5 X1 Y2
component class U_DCDC_Converters: *13 *14 *15 *16 *17 *18 C15 C55 C56 C57 C58 C59 C60 C61 C62 C64 C65 L3 R38 R39 U6
differential pair USB_ISOLATED_GNSS_D: +USB_ISOLATED_GNSS_D_P -USB_ISOLATED_GNSS_D_N
differential pair USB_D: +USB_D_P -USB_D_N
differential pair RX: +RX_P -RX_N
differential pair PMD_RD: +PMD_RD_P -PMD_RD_N
differential pair USB_MCU_D: +USB_MCU_D_P -USB_MCU_D_N
differential pair USB_ISOLATED_D: +USB_ISOLATED_D_P -USB_ISOLATED_D_N
differential pair TX: +TX_P -TX_N
differential pair PMD_TD: +PMD_TD_P -PMD_TD_N

## Components (designator, comment, footprint, x,y, rotation, side; value= is the part's Value field where it differs from the comment)
2 "testpoint" testpoint -1,-3.5 r90 top
3 "testpoint" testpoint -3,-3.5 r90 top
4 "testpoint" testpoint 3,2.5 r90 top
5 "testpoint" testpoint -3,0.5 r90 top
6 "testpoint" testpoint -3,2.5 r90 top
7 "testpoint" testpoint -3,5.5 r90 top
*7 "testpoint" testpoint -9,20 r0 top
*8 "testpoint" testpoint -9,18 r0 top
*10 "testpoint" testpoint -9,39 r90 top
*11 "testpoint" testpoint -9,37 r0 top
*13 "testpoint" testpoint 8,24 r90 top
*14 "testpoint" testpoint 1.483,-3.5 r90 top
*15 "testpoint" testpoint 9,17 r90 top
*16 "testpoint" testpoint 12,-39 r90 top
*17 "testpoint" testpoint -9.119,-39.573 r90 top
*18 "testpoint" testpoint 12,38 r90 top
*19 "testpoint" testpoint 39,17 r90 top
*20 "testpoint" testpoint 11.4,9.4 r90 top
*21 "testpoint" testpoint 36,17 r0 top
*22 "testpoint" testpoint 39,34 r90 top
*24 "testpoint" testpoint 36,34 r90 top
*25 "testpoint" testpoint 9,-39 r90 top
*26 "testpoint" testpoint 3,38 r90 top
*27 "testpoint" testpoint 6,38 r90 top
*28 "testpoint" testpoint 9,14 r90 top
*29 "testpoint" testpoint 9,38 r90 top
B1 "AG9905-MTB" AG9905MTB 22,-27.5 r270 top locked
C1 "1uF" CAPC0402(1005)60_L 2.25,4.5 r270 top
C2 "100nF" CAPC1005X55X25LL05T10 2.25,6 r90 top
C3 "100nF" CAPC1005X55X25LL05T10 1.905,0 r90 top
C4 "1uF" CAPC0402(1005)60_L 2.819,0 r90 top
C5 "220nF" CAPC1005X55X25NL05T05 0.025,-1.956 r180 top
C7 "100nF" CAPC1005X55X25LL05T10 -29.05,31.625 r180 top
C8 "10uF" FP-GRM188-0_2-IPC_C -9.4,25.8 r90 top
C9 "100nF" CAPC1005X55X25LL05T10 -10.4,25.8 r90 top
C10 "1uF" CAPC1608X90N -34.5,-6.196 r90 top
C11 "100nF" CAPC1608X90N -33.3,-6.2 r90 top
C12 "1uF" CAPC1608X90N -34.5,-3.825 r270 top
C13 "100nF" CAPC1608X90N -33.3,-3.825 r270 top
C14 "1uF" CAPC1608X90N -32.2,10.175 r270 top
C15 "22uF" CAPC2013X152X50ML20T25 3,20 r90 top
C16 "100nF" CAPC1608X90N -21.075,15.7 r180 top
C17 "100nF" CAPC1608X90N -15.85,15.7 r180 top
C18 "100nF" CAPC1608X90N -7.8,10.825 r90 top
C19 "100nF" CAPC1608X90N -7.825,3.675 r90 top
C20 "100nF" CAPC1608X90N -12.25,-8.75 r0 top
C21 "100nF" CAPC1608X90N -18.925,-9.275 r90 top
C22 "100nF" CAPC1608X90N -25.925,-9.275 r90 top
C23 "100nF" CAPC1608X90N -33.75,-1.575 r0 top
C24 "100nF" CAPC1608X90N -33.075,1.875 r0 top
C25 "100nF" CAPC1608X90N -32.548,3.877 r90 top
C26 "220pF" CAPC1608X87N -32.9,6.4 r90 top
C27 "10uF" CAPC2013X140N -36.327,6.604 r90 top
C28 "100nF" CAPC1608X90N -27.775,12.075 r180 bottom
C29 "100nF" CAPC1608X90N -11.95,9.85 r0 bottom
C30 "100nF" CAPC1608X90N -13.2,-5.1 r0 bottom
C31 "100nF" CAPC1005X55X25ML05T10 -33.75,0.375 r270 top
C32 "10uF" CAPC2013X140N -35.625,3.8 r90 top
C33 "10uF" CAPC2013X140N -33.95,3.8 r90 top
C34 "5.1pF" CAPC1005X55X25NL05T10 -34.6,12.6 r180 top
C35 "5.1pF" CAPC1005X55X25NL05T10 -36.6,12.6 r0 top
C36 "10nF" GRM15x 9.7,-9.6 r90 top
C37 "100nF" CAPC1005X55X25LL05T10 10.6,-9.6 r90 top
C38 "1uF" CAPC1005X70N 11.5,-9.6 r90 top
C39 "10uF" GRM15x 12.4,-9.6 r90 top
C40 "10nF" GRM15x 2.4,-5.7 r270 top
C41 "100nF" CAPC1005X55X25LL05T10 1.5,-5.7 r270 top
C42 "1uF" CAPC1005X70N 0.6,-5.7 r270 top
C43 "10uF" GRM15x -0.3,-5.7 r270 top
C44 "100nF" CAPC1005X55X25LL05T10 18.7,-2.9 r270 bottom
C45 "DNP" CAPC1005X55X25LL05T10 19.6,-2.9 r270 bottom value=100nF
C46 "100nF" CAPC1005X55X25LL05T10 18.7,-11.475 r90 bottom
C47 "DNP" CAPC1005X55X25LL05T10 19.6,-11.475 r90 bottom value=100nF
C48 "22pF" C0402C104J4RACTU 13.3,-2.4 r270 top
C49 "22pF" C0402C104J4RACTU 8.3,-3.7 r270 top
C50 "100nF" CAPC1005X55X25LL05T10 9.8,-11.7 r90 top
C51 "10nF/200V" CAPC0603(1608)100_L 26.6,-20.6 r90 bottom value=10nF
C52 "10nF/200V" CAPC0603(1608)100_L 28.8,-20.6 r90 bottom value=10nF
C53 "10nF" GRM15x 7.8,-13.4 r90 top
C54 "1nF/2kV" CAPC3216X180N 22.05,-15 r0 top
C55 "100nF" CAPC1005X55X25ML05T10 1,16.7 r270 top
C56 "4.7uF/50V" CAPC2012X145N 6.775,15.15 r270 top
C57 "1uF/50V" CAPC3216X110X50LL20T25 4.7,15.7 r270 top
C58 "1uF/50V" CAPC3216X110X50LL20T25 2.6,15.7 r270 top
C59 "100nF" CAPC1005X55X25ML05T10 1,14.675 r90 top
C60 "22uF" CAPC2013X152X50ML20T25 5,20 r90 top
C61 "22uF" CAPC2013X152X50ML20T25 3,23.75 r270 top
C62 "10uF" FP-GRM188-0_2-IPC_C 6.75,19.5 r90 top
C63 "10uF" FP-GRM188-0_2-IPC_C -9.3,31 r90 top
C64 "100nF" CAPC1005X55X25ML05T10 8,19.5 r90 top
C65 "1uF/50V" CAPC3216X110X50LL20T25 -4.75,16.575 r0 top
C66 "10uF" CAPC2013X140N 31.2,16.9 r90 top
C67 "10uF" CAPC2013X140N 13.3,15 r270 top
C68 "4.7uF" CAPC1608X95N 30.825,4.075 r180 top
C69 "1nF" FP-C0805C-DN-MFG 30.825,5.5 r0 top value="1,000 pF"
C70 "1nF" FP-C0805C-DN-MFG 30.75,5.7 r0 bottom value="1,000 pF"
C71 "1nF" FP-C0805C-DN-MFG 16.1,3.6 r270 top value="1,000 pF"
C72 "1nF" FP-C0805C-DN-MFG 14,3.6 r270 top value="1,000 pF"
C73 "DNP" CAPC3216X180N 21.975,10 r0 bottom
C74 "10uF" CAPC2013X140N 30.825,37 r90 top
C75 "10uF" CAPC2013X140N 13.2,34.98 r270 top
C76 "4.7uF" CAPC1608X95N 30.9,23 r180 top
C77 "1nF" FP-C0805C-DN-MFG 31.025,24.575 r0 top value="1,000 pF"
C78 "1nF" FP-C0805C-DN-MFG 31.025,24.925 r0 bottom value="1,000 pF"
C79 "1nF" FP-C0805C-DN-MFG 16.1,23.7 r270 top value="1,000 pF"
C80 "1nF" FP-C0805C-DN-MFG 14,23.7 r270 top value="1,000 pF"
C81 "DNP" CAPC3216X180N 21.95,30.075 r0 bottom
C82 "100nF" FP-C0603C-CF-MFG -20.9,-22.3 r180 top value="0.10 μF"
C83 "100nF" FP-C0603C-CF-MFG -6.6,-33.2 r270 top value="0.10 μF"
C84 "100uF" NIC-CAPA2-6.3X7.7_V 8.9,-21.8 r180 top locked
C85 "10uF" FP-GRM188-0_2-IPC_C 12.8,-17.9 r270 top
C86 "100nF" CAPC1608X90N -28.175,15.7 r180 top
C87 "100nF" CAPC1608X90N -7.2,-1.475 r0 top
C88 "100nF" CAPC1005X55X25LL05T10 -10.4,31.4 r90 top
D1 "LED Green" WL-SMCW_0603_150060xx75000 -0.2,-39.6 r270 top
D2 "LED Green" WL-SMCW_0603_150060xx75000 -40,18 r180 top
D3 "LED Yellow" WL-SMCW_0603_150060xx75000 2.3,-39.6 r270 top
D4 "LED Red" WL-SMCW_0603_150060xx75000 -40,15 r180 top
D5 "LED Green" WL-SMCW_0603_150060xx75000 -5.2,-39.6 r270 top
D6 "LED Yellow" WL-SMCW_0603_150060xx75000 -2.7,-39.6 r270 top
D7 "LED Red" WL-SMCW_0603_150060xx75000 -40,-6 r180 top
D8 "LED Green" WL-SMCW_0603_150060xx75000 -40,-8.5 r180 top
D9 "LED Yellow" WL-SMCW_0603_150060xx75000 -40,-11 r180 top
D10 "SMCJ58CA-E3/57T" FP-95402-MFG 28.1,-25.1 r180 bottom
D11 "MB4S" FP-751EP-MFG 28,-33.2 r90 bottom value=13pF
FB1 "BLM18KG601SN1D" FP-BLM18-0_15-t0_8-IPC_A 12.3,-11.6 r180 top
FB2 "BLM18KG601SN1D" FP-BLM18-0_15-t0_8-IPC_A -2.7,-5.7 r180 top
FB3 "BLM18KG601SN1D" FP-BLM18-0_15-t0_8-IPC_A 32.7,10.9 r90 bottom
FB4 "BLM18KG601SN1D" FP-BLM18-0_15-t0_8-IPC_A 39.825,10 r0 bottom
FB5 "BLM18KG601SN1D" FP-BLM18-0_15-t0_8-IPC_A 32.475,29.35 r90 bottom
FB6 "BLM18KG601SN1D" FP-BLM18-0_15-t0_8-IPC_A 39.9,27 r0 bottom
IC1 "STM32H755ZIT6U" QFP50P2200X2200X160-144N -20,3.5 r0 top locked
IC2 "M24C64-FMN6TP" SOIC127P600X175-8N -23,-26 r0 top locked
IC3 "MX25L51245GMI-08G" SOIC127P1030X265-16N -3.4,-26 r90 top locked
J1 "SMA-J-P-H-ST-EM1" FP-SMA-J-P-H-ST-EM1-MFG -46.76,24.825 r270 top locked
J2 "12402012E212A" AMPHENOL_12402012E212A 40,10 r90 top locked
J3 "12402012E212A" AMPHENOL_12402012E212A 40,27 r90 top locked
L1 "LQG15HS47NJ02D" FP-LQG15HH_02-IPC_B -29.3,33.45 r90 top value=47nH
L2 "2,2uH, 1.2A" LQM2MPN1R0NG0L -34.5,6.525 r90 top
L3 "6.8uH" DR736R8R -2.475,22.825 r0 top
"MIKROBUS 1" "MIKROBUS HOST CONN." "MIKROBUS HOST CONN. SMD" -22.5,-25.5 r90 top locked
r "testpoint" testpoint -29,40 r0 top
R1 "2k2" RESC1005X40X25NL05T10 -2.388,-1.016 r0 top
R2 "0R" RESC1005X40X25LL05T10 -20.6,40.1 r270 top value=0Ohm
R3 "10R" RESC1608X55X25NL10T15 -29,29.35 r270 top value=10Ohm
R4 "330R" RESC0402(1005)_M 1.025,-39.925 r90 top value="330.00 Ohm"
R5 "330R" RESC0402(1005)_M -40,19.5 r0 top value="330.00 Ohm"
R6 "330R" RESC0402(1005)_M 3.525,-39.925 r90 top value="330.00 Ohm"
R7 "330R" RESC0402(1005)_M -40,16.5 r0 top value="330.00 Ohm"
R8 "330R" RESC0402(1005)_M -3.975,-39.925 r90 top value="330.00 Ohm"
R9 "330R" RESC0402(1005)_M -1.475,-39.925 r90 top value="330.00 Ohm"
R10 "330R" RESC0402(1005)_M -40,-7.25 r0 top value="330.00 Ohm"
R11 "330R" RESC0402(1005)_M -40,-9.75 r0 top value="330.00 Ohm"
R12 "330R" RESC0402(1005)_M -40,-12.25 r0 top value="330.00 Ohm"
R13 "10k" RESC2012X70N -30.4,17.8 r0 top
R14 "10k" RESC2012X70N -32.3,16 r180 top
R15 "10k" RESC2012X70N -30.4,19.6 r180 top
R16 "0R" RESC1005X40X25LL05T10 -36.7,-6.1 r0 top value=0Ohm
R17 "0R" RESC1005X40X25LL05T10 -35.475,-4.975 r90 top value=0Ohm
R18 "0R" RESC1005X40X25LL05T10 -35.5,-7.2 r90 top value=0Ohm
R19 "4.7k" RESC1005X40X25LL05T05 -17.85,-27.9 r0 top
R20 "4.7k" RESC1005X40X25LL05T05 -17.825,-26.625 r0 top
R21 "4.7k" RESC1005X40X25LL05T05 -20.2,-10.7 r180 top
R22 "0R" RESC1005X40X25LL05T10 -34.2,9.2 r90 top value=0Ohm
R23 "4.7k" RESC1005X40X25LL05T05 -21.6,-10.7 r0 top
R24 "10k" RESC2012X70N -10.6,-20.8 r0 bottom
R25 "10k" RESC2012X70N -5.7,3.5 r90 top
R26 "10k" RESC2012X70N -5,-0.3 r270 top
R27 "0R" RESC1005X40X25LL05T10 -35.6,8.975 r180 top value=0Ohm
R28 "10k" RESC2012X70N -6.1,-1.15 r270 bottom
R29 "2k2" RESC2013X60X40LL20T25 4.6,-12.8 r90 top
R30 "2k2" RESC2013X60X40LL20T25 6.4,-12.8 r90 top
R31 "2k2" RESC2013X60X40LL20T25 4.1,-3.2 r270 top
R32 "0R" RESC1005X40X25NL05T10 10.312,-5.359 r0 top
R33 "DNP" RESC1005X40X25NL05T10 8.9,-11.7 r90 top
R34 "6k49" RESC1005X40X25NL05T05 7.35,-2.775 r270 top
R35 "2k2" RESC2013X60X40LL20T25 5.825,-3.2 r90 top
R36 "75R" RESC2013X60X40NL20T25 26.6,-17.1 r270 bottom
R37 "75R" RESC2013X60X40NL20T25 28.7,-17.1 r270 bottom
R38 "0R" RESC1005X40X25LL05T10 -2.95,14.775 r270 top value=0Ohm
R39 "DNP" RESC1005X40X25LL05T10 -4.15,15.125 r0 top value=0Ohm
R40 "5k1" ERJUP6 13.3,11.6 r270 top
R41 "10k" RESC1005X40X25ML05T05 14.975,9.4 r180 top
R42 "5k1" ERJUP6 28.2,9.425 r0 bottom
R43 "5k1" ERJUP6 28.175,11.05 r0 bottom
R44 "0R" RESC1005X40X25LL05T10 -7.6,31.8 r0 top value=0Ohm
R46 "5k1" ERJUP6 26.7,29.25 r0 bottom
R47 "5k1" ERJUP6 26.675,30.8 r0 bottom
R48 "10k" RESC1005X40X25ML05T05 -18.3,-24.7 r90 top
R49 "10k" RESC1005X40X25ML05T05 -0.3,-32.9 r270 top
R50 "DNP" RESC1005X40X25LL05T10 -5.3,-32.8 r90 top value=0Ohm
R51 "0R" RESC1005X40X25LL05T10 1,-19.2 r90 top value=0Ohm
R52 "47R" FP-RMCF2512-MFG 8.4,-29.4 r0 top locked value=47Ω
R53 "47R" FP-RMCF2512-MFG 8.4,-34.5 r0 top locked value=47Ω
R54 "100k" RESC0603(1608)_N 7,32.2 r180 top value="100000.00 Ohm"
R55 "100k" RESC0603(1608)_N 4.4,12 r90 top value="100000.00 Ohm"
R56 "33k" RESC3116X65X40LL10T20 7.5,30.6 r0 top
R57 "33k" RESC3116X65X40LL10T20 2.6,11.5 r270 top
R58 "4.7k" RESC1005X40X25LL05T05 1.025,-38.175 r270 top
R59 "4.7k" RESC1005X40X25LL05T05 3.525,-38.175 r270 top
R60 "4.7k" RESC1005X40X25LL05T05 -3.975,-38.175 r270 top
R61 "4.7k" RESC1005X40X25LL05T05 -1.475,-38.175 r270 top
SW1 "EVP-AA002K" PNSC-EVPAA_V -38.275,-1.275 r270 top
T1 "SM91072AL" SOIC127P950X590-16N 21.7,-7.2 r0 top locked value=350uH
U1 "ISM330DHCXTR" FP-LGA-14L-DM00249496-MFG 0,5 r90 top locked
U2 "LSM303AGRTR" FP-LGA-12-8487206-MFG 0,0 r0 top locked
U3 "ZED-X20P-00B" ZED-F9P -19.55,28.05 r270 top locked
U4 "DP83826ERHBR" QFN_ERHBR_TEX 5.999,-7.95 r180 top locked
U5 "TPD4E05U06QDQARQ1" FP-DQA0010A-MFG 12.2,-7.2 r0 top locked value=0.5pF
U6 "LMR43620MC3RPERQ1" LMR43620MC3RPERQ1 -1,16 r90 top locked
U7 "TDN 5-0911WISM" "TDN 5WISM SINGLE_TRP" 22.25,15 r0 top locked
U8 "ISOUSB111DWXR" DWX0016A 23,6 r180 top locked
U9 "TPD4S012DRYR" FP-DRY0006A-MFG 37.05,9.95 r270 bottom
U10 "TDN 5-0911WISM" "TDN 5WISM SINGLE_TRP" 22,35 r0 top locked
U11 "ISOUSB111DWXR" DWX0016A 23,26 r180 top locked
U12 "TPD4S012DRYR" FP-DRY0006A-MFG 37.15,26.925 r270 bottom
U13 "TPS2116DRLR" DRL0008A-MFG 7,34.4 r0 top
U14 "TPS2116DRLR" DRL0008A-MFG 7,11.5 r270 top
X1 "M12D-04PFFR-SF7003" M12D04PFFRSF7003 31.964,-15.036 r90 top locked
X2 "TC2030-MCP-NL" 6-Pin_Needle_Programmer -2,37.2 r180 top
Y1 "NX3215SA-32.768K-STD-MUA-14" NX3215SA32768KSTDMUA8 -35.6,11 r180 top
Y2 "ABM8AIG-25.000MHZ-12-2Z-T3" FP-ABM8AIG-MFG 10.8,-3 r180 top

## Footprints (in the part's own frame and the unit in brackets; to place one, negate y for a bottom-side part, rotate by r counter-clockwise, add the part's x,y. Pads: shape width x height; smd on the part's side, far side on the other; paste and mask are expansions set on the pad)
6-Pin_Needle_Programmer [mil] "TC2030-MCP-NL"
  round 31 smd paste-33: 1(-50,-25) 2(-50,25) 3(0,-25) 4(0,25) 5(50,-25) 6(50,25)
  round 20 hole 39 unplated: ""(-100,0) ""(100,-40) ""(100,40)
AG9905MTB [mm]
  rect 3.81x1.83 smd: 1(-8.655,-5.79) 4(7.935,5.79) 5(-8.655,5.79)
  rect 1.83x3.81 smd: 2(6.535,-4.85) 3(8.875,-4.85)
  silkscreen extent -10.85,-7.79 10.85,7.21, body extent -10.93,-7.58 10.93,7.04, height 13
AMPHENOL_12402012E212A [mm]
  rect 0.6x1.14 smd: A1_B12(-3.2,4.75) A4_B9(-2.4,4.75) B1_A12(3.2,4.75) B4_A9(2.4,4.75)
  rect 0.3x1.14 smd: A5(-1.25,4.75) A6(-0.25,4.75) A7(0.25,4.75) A8(1.25,4.75) B5(1.75,4.75) B6(0.75,4.75) B7(-0.75,4.75) B8(-1.75,4.75)
  oval 1.05x2.1 hole 0.6 slot 1.7 at 90 deg: SH1(-4.32,4.18) SH2(4.32,4.18)
  oval 0.9x1.8 hole 0.6 slot 1.4 at 90 deg: SH3(-4.32,0) SH4(4.32,0)
  round 0.65 hole 0.65 unplated: ""(-2.89,3.68) ""(2.89,3.68)
  silkscreen extent -4.47,-1.22 4.47,2.81, body extent -4.47,-2.65 4.47,4.95, height 3.35
C0402C104J4RACTU [mm] "Chip Capacitor, 2-Leads, Body 1.00x0.50mm, IPC High Density"
  rect 0.56x0.52 smd: 1(-0.39,0) 2(0.39,0)
  body extent -0.53,-0.28 0.53,0.28, height 0.55
CAPC0402(1005)60_L [mm] "Chip Capacitor, Body 1.0x0.5mm, Height 0.6mm, IPC High Density"
  rect 0.52x0.52 smd: 1(-0.4,0) 2(0.4,0)
  body extent -0.55,-0.3 0.55,0.3, height 0.6
CAPC0603(1608)100_L [mm] "Chip Capacitor, Body 1.6x0.8mm, Height 1.0mm, IPC High Density"
  rect 0.7x0.9 smd: 1(-0.7,0) 2(0.7,0)
  silkscreen extent -0.05,-0.35 0.05,0.35, body extent -0.87,-0.47 0.88,0.48, height 1
CAPC1005X55X25LL05T10 [mm] "Chip Capacitor, 2-Leads, Body 1.00x0.50mm, IPC High Density"
  rect 0.56x0.52 smd: 1(-0.39,0) 2(0.39,0)
  body extent -0.53,-0.28 0.53,0.28, height 0.55
CAPC1005X55X25ML05T10 [mm] "Chip Capacitor, 2-Leads, Body 1.00x0.50mm, IPC Low Density"
  rect 0.76x0.72 smd: 1(-0.49,0) 2(0.49,0)
  body extent -0.53,-0.28 0.53,0.27, height 0.55
CAPC1005X55X25NL05T05 [mm] "Chip Capacitor, 2-Leads, Body 1.00x0.50mm, IPC Medium Density"
  rect 0.62x0.62 smd: 1(-0.46,0) 2(0.46,0)
  body extent -0.53,-0.28 0.53,0.27, height 0.55
CAPC1005X55X25NL05T10 [mm] "Chip Capacitor, 2-Leads, Body 1.00x0.50mm, IPC Medium Density"
  rect 0.66x0.62 smd: 1(-0.44,0) 2(0.44,0)
  body extent -0.53,-0.28 0.53,0.27, height 0.55
CAPC1005X70N [mm] "Chip Capacitor, 2-Leads, Body 1.00x0.50mm, IPC High Density"
  rect 0.56x0.52 smd: 1(-0.39,0) 2(0.39,0)
  body extent -0.53,-0.28 0.53,0.28, height 0.55
CAPC1608X87N [mm]
  rect 0.8x0.94 smd: 1(-0.67,0) 2(0.67,0)
  body extent -0.8,-0.4 0.8,0.4, height 0.87
CAPC1608X90N [mm]
  rect 0.83x0.94 smd: 1(-0.66,0) 2(0.66,0)
  body extent -0.8,-0.4 0.8,0.4, height 0.8
CAPC1608X95N [mm]
  rect 0.76x0.98 smd: 1(-0.71,0) 2(0.71,0)
  body extent -0.8,-0.4 0.8,0.4, height 0.95
CAPC2012X145N [mm]
  rect 0.97x1.47 smd: 1(-0.83,0) 2(0.83,0)
CAPC2013X140N [mm]
  rect 0.96x1.44 smd: 1(-0.82,0) 2(0.82,0)
  body extent -1.02,-0.65 1.02,0.65, height 1.4
CAPC2013X152X50ML20T25 [mm] "Chip Capacitor, 2-Leads, Body 2.01x1.25mm, IPC Low Density"
  rect 1.55x1.55 smd: 1(-0.925,0) 2(0.925,0)
  body extent -1.1,-0.72 1.11,0.72, height 1.52
CAPC3216X110X50LL20T25 [mm] "Chip Capacitor, 2-Leads, Body 3.20x1.60mm, IPC High Density"
  rect 1.1x1.7 smd: 1(-1.3,0) 2(1.3,0)
  silkscreen extent -0.35,-0.75 0.35,0.75, body extent -1.7,-0.9 1.7,0.9, height 1.1
CAPC3216X180N [mm]
  rect 1.05x1.82 smd: 1(-1.39,0) 2(1.39,0)
  silkscreen extent 0,-0.7 0,0.7
DR736R8R [mm]
  rect 2.5x3.25 smd: 1(-3,0) 2(3,0)
  silkscreen extent -4.8,-3.8 3.8,3.8
DRL0008A-MFG [mm]
  rect 0.67x0.3 smd paste+0 mask+0: 1(-0.74,0.75) 2(-0.74,0.25) 3(-0.74,-0.25) 4(-0.74,-0.75) 5(0.74,-0.75) 6(0.74,-0.25) 7(0.74,0.25) 8(0.74,0.75)
  silkscreen extent -1.77,-1.28 0.65,1.28
DWX0016A [mm]
  rrect22% 1.7x0.41 smd: 1(-4.85,2.275) 2(-4.85,1.625) 3(-4.85,0.975) 4(-4.85,0.325) 5(-4.85,-0.325) 6(-4.85,-0.975) 7(-4.85,-1.625) 8(-4.85,-2.275) 9(4.85,-2.275) 10(4.85,-1.625) 11(4.85,-0.975) 12(4.85,-0.325) 13(4.85,0.325) 14(4.85,0.975) 15(4.85,1.625) 16(4.85,2.275)
  silkscreen extent -5.13,-3.25 3.5,3.25, body extent -5.22,-2.97 5.22,2.97, height 2.59
ERJUP6 [mm]
  rect 1.15x1.25 smd: 1(-1.175,0) 2(1.175,0)
  silkscreen extent -1.99,-1.26 -1.89,-1.16, body extent -1,-0.63 1,0.63, height 0.6
FP-751EP-MFG [mm]
  rect 2.1x1.55 smd paste+0 mask+0: 1(-3.25,1.27) 2(-3.25,-1.27) 3(3.25,-1.27) 4(3.25,1.27)
  silkscreen extent -4.97,-2.47 1.8,2.47, body extent -3.37,-2.36 3.37,2.36, height 2.9
FP-95402-MFG [mm]
  rect 1.72x3.2 smd paste+0 mask+0: 1(-3.205,0) 2(3.205,0)
  silkscreen extent -3.55,-3.11 3.55,3.11, body extent -3.97,-2.95 3.97,2.95, height 2.62
FP-ABM8AIG-MFG [mm]
  rect 1.4x1.2 smd paste+0 mask+0: 1(-1.1,-0.8) 2(1.1,-0.8) 3(1.1,0.8) 4(-1.1,0.8)
  silkscreen extent -2.32,-2.32 1.65,1.8, body extent -1.9,-1.5 1.9,1.5, height 0.25
FP-BLM18-0_15-t0_8-IPC_A [mm]
  rect 1.306x1.058 smd paste+0 mask+0: 1(-0.776,0) 2(0.776,0)
  body extent -0.8,-0.4 0.8,0.4, height 0.95
FP-C0603C-CF-MFG [mm]
  rect 0.75x0.9 smd paste+0 mask+0: 1(-0.6,0) 2(0.6,0)
  silkscreen extent -0.87,-0.85 0.88,0.85, body extent -1.2,-0.6 1.2,0.6, height 0.25
FP-C0805C-DN-MFG [mm]
  rect 0.95x1.35 smd paste+0 mask+0: 1(-0.75,0) 2(0.75,0)
  body extent -1,-0.63 1,0.63, height 0.88
FP-DQA0010A-MFG [mm]
  rrect50% 0.565x0.2 smd paste+0 mask+0: 1(-0.417,1) 2(-0.417,0.5) 4(-0.417,-0.5) 5(-0.417,-1) 6(0.417,-1) 7(0.417,-0.5) 9(0.417,0.5) 10(0.417,1)
  rrect25% 0.565x0.4 smd paste-1000 mask+0: 3(-0.417,0) 8(0.417,0)
  silkscreen extent -1.71,-1.48 0.55,1.48, body extent -0.8,-1.4 0.8,1.4, height 0.25
FP-DRY0006A-MFG [mm]
  rrect67% 0.45x0.3 smd paste-1000 mask-1000: 1(-0.275,0.5)
  rrect67% 0.4x0.3 smd paste-1000 mask-1000: 2(-0.3,0) 3(-0.3,-0.5) 4(0.3,-0.5) 5(0.3,0) 6(0.3,0.5)
  silkscreen extent -1.17,-1.05 0.53,1.1, body extent -0.5,-0.72 0.5,0.72, height 0.6
FP-GRM188-0_2-IPC_C [mm]
  rect 0.905x0.906 smd paste+0 mask+0: 1(-0.601,0) 2(0.601,0)
  body extent -1.15,-0.6 1.15,0.6, height 0.25
FP-LGA-12-8487206-MFG [mm]
  rect 0.375x0.35 smd paste+0 mask+0: 1(-0.763,0.75) 2(-0.763,0.25) 3(-0.763,-0.25) 4(-0.763,-0.75) 7(0.763,-0.75) 8(0.763,-0.25) 9(0.763,0.25) 10(0.763,0.75)
  rect 0.35x0.375 smd paste+0 mask+0: 5(-0.25,-0.763) 6(0.25,-0.763) 11(0.25,0.763) 12(-0.25,0.763)
  silkscreen extent -1.92,-1.35 1.35,1.35, body extent -1,-1 1,1, height 1
FP-LGA-14L-DM00249496-MFG [mm]
  rect 0.575x0.35 smd paste-1000 mask+0: 1(-1.162,0.75) 2(-1.162,0.25) 3(-1.162,-0.25) 4(-1.162,-0.75) 8(1.162,-0.75) 9(1.162,-0.25) 10(1.162,0.25) 11(1.162,0.75)
  rect 0.35x0.575 smd paste-1000 mask+0: 5(-0.5,-0.913) 6(0,-0.913) 7(0.5,-0.913) 12(0.5,0.913) 13(0,0.913) 14(-0.5,0.913)
  silkscreen extent -2.57,-1.6 1.85,1.6, body extent -1.5,-1.25 1.5,1.25, height 0.86
FP-LQG15HH_02-IPC_B [mm]
  rect 0.615x0.572 smd paste+0 mask+0: 1(-0.429,0) 2(0.429,0)
  silkscreen extent -1.39,0.83 -1.14,1.08, body extent -0.89,-0.44 0.89,0.44, height 0.25
FP-RMCF2512-MFG [mm]
  rect 1.55x3.5 smd paste+0 mask+0: 1(-3.225,0) 2(3.225,0)
  silkscreen extent -2.08,-1.73 2.07,1.73, body extent -4.1,-1.85 4.1,1.85, height 0.25
FP-SMA-J-P-H-ST-EM1-MFG [mm]
  rect 1.27x3.6 smd paste+0 mask+0: 1(0,6.66)
  rect 1.35x4.2 smd paste+0 mask+0: 2(-2.825,6.86) 3(2.825,6.86)
  rect 1.35x4.2 smd far side paste+0 mask+0: 4(-2.825,6.86) 5(2.825,6.86)
  silkscreen extent -3.9,5.5 3.9,9.49, body extent -3.6,-4.92 3.6,9.06, height 0.25
GRM15x [mm] "Chip Capacitor, 2-Leads, Body 1.00x0.50mm, IPC High Density"
  rect 0.56x0.52 smd: 1(-0.39,0) 2(0.39,0)
  body extent -0.53,-0.28 0.53,0.28, height 0.55
LMR43620MC3RPERQ1 [mm]
  round 0.342 smd paste-0.158 mask+0: 1(-0.661,0.877)
  rect 0.6x0.25 smd paste+0 mask+0: 2(-0.9,0.25) 3(-0.9,-0.25) 6(0.9,-0.25) 7(0.9,0.25)
  round 0.291 smd paste+0 mask+0: 4(-0.661,-0.877)
  round 0.323 smd paste+0 mask+0: 5(0.68,-0.805)
  round 0.346 smd paste-0.16 mask+0: 8(0.665,0.841)
  rect 0.35x1.3 smd paste-0.637 mask+0: 9(0,0.55)
  Top Layer (HSig) region: -1.2,0.676 -1.2,0.8 -1.15,0.851 -0.9,0.851 -0.85,0.901 -0.85,1.15 -0.8,1.2 -0.5,1.2 -0.45,1.15 -0.45,0.676 -0.5,0.625 -1.15,0.626
  Top Layer (HSig) region: 1.2,-0.676 1.2,-0.8 1.15,-0.851 0.9,-0.85 0.85,-0.901 0.85,-1.15 0.8,-1.2 0.55,-1.2 0.5,-1.15 0.5,-0.676 0.55,-0.625 1.15,-0.626
  Top Layer (HSig) region: -1.2,-0.676 -1.2,-0.8 -1.15,-0.85 -0.9,-0.851 -0.85,-0.901 -0.85,-1.15 -0.8,-1.2 -0.55,-1.2 -0.5,-1.15 -0.5,-0.676 -0.55,-0.625 -1.15,-0.626
  Top Layer (HSig) region: 1.2,0.676 1.2,0.8 1.15,0.85 0.9,0.851 0.85,0.901 0.85,1.15 0.8,1.2 0.5,1.2 0.45,1.15 0.45,0.676 0.5,0.625 1.15,0.626
  silkscreen extent -1.87,-1.33 1.33,1.33
LQM2MPN1R0NG0L [mm]
  rect 0.8x1.8 smd: 1(-0.8,0) 2(0.8,0)
  body extent -1,-0.8 1,0.8, height 0.9
M12D04PFFRSF7003 [mm]
  rect 1.95x1.95 hole 1.3: 1(0,0)
  round 1.95 hole 1.3: 2(3.536,0) 3(3.536,-3.536) 4(0,-3.536)
  round 1.05 hole 2.1 unplated: 6(-5.732,-1.768) 7(9.268,-1.768)
  round 1.425 hole 2.85 unplated: 8(-5.732,-5.768) 9(9.268,-5.768)
  silkscreen extent -7.83,-8.38 11.37,0.77, body extent -7.75,-25.2 11.43,1.58, height 15.88
"MIKROBUS HOST CONN. SMD" [mm]
  round 1.4 hole 1.4 unplated: 0(-12.094,-9.703) 0(11.106,-9.703)
  rrect20% 2.7x1.3 smd mask+0.076: 1(-12.88,9.728) 2(-12.88,7.188) 3(-12.88,4.648) 4(-12.88,2.108) 5(-12.88,-0.432) 6(-12.88,-2.972) 7(-12.88,-5.512) 8(-12.88,-8.052) 9(12.88,-8.052) 10(12.88,-5.512) 11(12.88,-2.972) 12(12.88,-0.432) 13(12.88,2.108) 14(12.88,4.648) 15(12.88,7.188) 16(12.88,9.728)
  silkscreen extent -13.97,-13.13 13.97,15.22, body extent -13.72,-11.88 13.74,11.01, height 11.01
NIC-CAPA2-6.3X7.7_V [mm] "Aluminum Electrolytic Capacitor, Diameter 6.3mm, Height 8mm, Pitch 5.4mm"
  rect 3.5x1.6 smd: 1(-2.7,0) 2(2.7,0)
  silkscreen extent -3.4,-3.4 3.4,3.4, body extent -3.14,-3.12 3.14,3.15, height 8
NX3215SA32768KSTDMUA8 [mm]
  rect 1x1.8 smd: 1(-1.25,0) 2(1.25,0)
  silkscreen extent -2.4,-0.05 -2.3,0.05, body extent -1.6,-0.75 1.6,0.75, height 0.8
PNSC-EVPAA_V [mm] "SMD, 4-Leads, Body 2.9x3.5mm, Pitch 1.45mm"
  rect 1.15x1.05 smd: 1(-1.675,0.725) 2(-1.675,-0.725) 3(1.675,0.725) 4(1.675,-0.725)
  silkscreen extent -2.92,-1.45 0.7,1.45, body extent -1.75,-1.45 1.75,1.45, height 1.9
QFN_ERHBR_TEX [mil]
  rect 32x10 smd paste+0 mask+0: 1(-96.5,68.91) 2(-96.5,49.22) 3(-96.5,29.53) 4(-96.5,9.84) 5(-96.5,-9.85) 6(-96.5,-29.53) 7(-96.5,-49.23) 8(-96.5,-68.91) 17(96.5,-68.91) 18(96.5,-49.23) 19(96.5,-29.53) 20(96.5,-9.85) 21(96.5,9.84) 22(96.5,29.53) 23(96.5,49.22) 24(96.5,68.91)
  rect 10x32 smd paste+0 mask+0: 9(-68.91,-96.5) 10(-49.23,-96.5) 11(-29.54,-96.5) 12(-9.85,-96.5) 13(9.84,-96.5) 14(29.53,-96.5) 15(49.22,-96.5) 16(68.91,-96.5) 25(68.91,96.5) 26(49.22,96.5) 27(29.53,96.5) 28(9.84,96.5) 29(-9.85,96.5) 30(-29.54,96.5) 31(-49.23,96.5) 32(-68.91,96.5)
  rect 87x87 smd paste+0 mask+0: 33(0,0)
  silkscreen extent -106,-132 132,132, body extent -101,-101 101,101, height 39
QFP50P2200X2200X160-144N [mm]
  rect 1.475x0.3 smd: 1(-10.738,8.75) 2(-10.738,8.25) 3(-10.738,7.75) 4(-10.738,7.25) 5(-10.738,6.75) 6(-10.738,6.25) 7(-10.738,5.75) 8(-10.738,5.25) 9(-10.738,4.75) 10(-10.738,4.25) 11(-10.738,3.75) 12(-10.738,3.25) 13(-10.738,2.75) 14(-10.738,2.25) 15(-10.738,1.75) 16(-10.738,1.25) 17(-10.738,0.75) 18(-10.738,0.25) 19(-10.738,-0.25) 20(-10.738,-0.75) 21(-10.738,-1.25) 22(-10.738,-1.75) 23(-10.738,-2.25) 24(-10.738,-2.75) 25(-10.738,-3.25) 26(-10.738,-3.75) 27(-10.738,-4.25) 28(-10.738,-4.75) 29(-10.738,-5.25) 30(-10.738,-5.75) 31(-10.738,-6.25) 32(-10.738,-6.75) 33(-10.738,-7.25) 34(-10.738,-7.75) 35(-10.738,-8.25) 36(-10.738,-8.75) 73(10.738,-8.75) 74(10.738,-8.25) 75(10.738,-7.75) 76(10.738,-7.25) 77(10.738,-6.75) 78(10.738,-6.25) 79(10.738,-5.75) 80(10.738,-5.25) 81(10.738,-4.75) 82(10.738,-4.25) 83(10.738,-3.75) 84(10.738,-3.25) 85(10.738,-2.75) 86(10.738,-2.25) 87(10.738,-1.75) 88(10.738,-1.25) 89(10.738,-0.75) 90(10.738,-0.25) 91(10.738,0.25) 92(10.738,0.75) 93(10.738,1.25) 94(10.738,1.75) 95(10.738,2.25) 96(10.738,2.75) 97(10.738,3.25) 98(10.738,3.75) 99(10.738,4.25) 100(10.738,4.75) 101(10.738,5.25) 102(10.738,5.75) 103(10.738,6.25) 104(10.738,6.75) 105(10.738,7.25) 106(10.738,7.75) 107(10.738,8.25) 108(10.738,8.75)
  rect 0.3x1.475 smd: 37(-8.75,-10.738) 38(-8.25,-10.738) 39(-7.75,-10.738) 40(-7.25,-10.738) 41(-6.75,-10.738) 42(-6.25,-10.738) 43(-5.75,-10.738) 44(-5.25,-10.738) 45(-4.75,-10.738) 46(-4.25,-10.738) 47(-3.75,-10.738) 48(-3.25,-10.738) 49(-2.75,-10.738) 50(-2.25,-10.738) 51(-1.75,-10.738) 52(-1.25,-10.738) 53(-0.75,-10.738) 54(-0.25,-10.738) 55(0.25,-10.738) 56(0.75,-10.738) 57(1.25,-10.738) 58(1.75,-10.738) 59(2.25,-10.738) 60(2.75,-10.738) 61(3.25,-10.738) 62(3.75,-10.738) 63(4.25,-10.738) 64(4.75,-10.738) 65(5.25,-10.738) 66(5.75,-10.738) 67(6.25,-10.738) 68(6.75,-10.738) 69(7.25,-10.738) 70(7.75,-10.738) 71(8.25,-10.738) 72(8.75,-10.738) 109(8.75,10.738) 110(8.25,10.738) 111(7.75,10.738) 112(7.25,10.738) 113(6.75,10.738) 114(6.25,10.738) 115(5.75,10.738) 116(5.25,10.738) 117(4.75,10.738) 118(4.25,10.738) 119(3.75,10.738) 120(3.25,10.738) 121(2.75,10.738) 122(2.25,10.738) 123(1.75,10.738) 124(1.25,10.738) 125(0.75,10.738) 126(0.25,10.738) 127(-0.25,10.738) 128(-0.75,10.738) 129(-1.25,10.738) 130(-1.75,10.738) 131(-2.25,10.738) 132(-2.75,10.738) 133(-3.25,10.738) 134(-3.75,10.738) 135(-4.25,10.738) 136(-4.75,10.738) 137(-5.25,10.738) 138(-5.75,10.738) 139(-6.25,10.738) 140(-6.75,10.738) 141(-7.25,10.738) 142(-7.75,10.738) 143(-8.25,10.738) 144(-8.75,10.738)
  silkscreen extent -11.35,-9.65 9.65,9.65, body extent -11,-11 11,11, height 1.6
RESC0402(1005)_M [mm] "Chip Resistor, Body 1.0x0.5mm, IPC Low Density"
  rect 0.65x0.75 smd: 1(-0.55,0) 2(0.55,0)
  body extent -0.52,-0.28 0.53,0.28, height 0.4
RESC0603(1608)_N [mm] "Chip Resistor, Body 1.6x0.8mm, IPC Medium Density"
  rect 0.9x1 smd: 1(-0.8,0) 2(0.8,0)
  silkscreen extent -0.05,-0.4 0.05,0.4, body extent -0.85,-0.47 0.85,0.47, height 0.6
RESC1005X40X25LL05T05 [mm] "Chip Resistor, 2-Leads, Body 1.00x0.50mm, IPC High Density"
  rect 0.45x0.45 smd: 1(-0.4,0) 2(0.4,0)
  body extent -0.53,-0.27 0.53,0.28, height 0.4
RESC1005X40X25LL05T10 [mm] "Chip Resistor, 2-Leads, Body 1.00x0.50mm, IPC High Density"
  rect 0.5x0.45 smd: 1(-0.375,0) 2(0.375,0)
  body extent -0.53,-0.27 0.53,0.28, height 0.4
RESC1005X40X25ML05T05 [mm] "Chip Resistor, 2-Leads, Body 1.00x0.50mm, IPC Low Density"
  rect 0.65x0.65 smd: 1(-0.5,0) 2(0.5,0)
  body extent -0.53,-0.27 0.53,0.28, height 0.4
RESC1005X40X25NL05T05 [mm] "Chip Resistor, 2-Leads, Body 1.00x0.50mm, IPC Medium Density"
  rect 0.55x0.55 smd: 1(-0.45,0) 2(0.45,0)
  body extent -0.53,-0.27 0.53,0.28, height 0.4
RESC1005X40X25NL05T10 [mm] "Chip Resistor, 2-Leads, Body 1.00x0.50mm, IPC Medium Density"
  rect 0.6x0.55 smd: 1(-0.425,0) 2(0.425,0)
  body extent -0.53,-0.27 0.53,0.28, height 0.4
RESC1608X55X25NL10T15 [mm] "Chip Resistor, 2-Leads, Body 1.70x0.90mm, IPC Medium Density"
  rect 0.7x0.9 smd: 1(-0.7,0) 2(0.7,0)
  body extent -0.85,-0.45 0.85,0.45, height 0.55
RESC2012X70N [mm]
  rect 1.05x1.4 smd: 1(-0.95,0) 2(0.95,0)
  body extent -1,-0.63 1,0.63, height 0.6
RESC2013X60X40LL20T25 [mm] "Chip Resistor, 2-Leads, Body 2.00x1.25mm, IPC High Density"
  rect 1x1.35 smd: 1(-0.75,0) 2(0.75,0)
  body extent -1.1,-0.72 1.1,0.72, height 0.6
RESC2013X60X40NL20T25 [mm] "Chip Resistor, 2-Leads, Body 2.00x1.25mm, IPC Medium Density"
  rect 1.2x1.45 smd: 1(-0.85,0) 2(0.85,0)
  body extent -1.1,-0.72 1.1,0.72, height 0.6
RESC3116X65X40LL10T20 [mm] "Chip Resistor, 2-Leads, Body 3.10x1.60mm, IPC High Density"
  rect 0.85x1.6 smd: 1(-1.325,0) 2(1.325,0)
  silkscreen extent -0.5,-0.7 0.5,0.7, body extent -1.6,-0.85 1.6,0.85, height 0.65
SOIC127P600X175-8N [mm]
  rect 1.525x0.65 smd: 1(-2.712,1.905) 2(-2.712,0.635) 3(-2.712,-0.635) 4(-2.712,-1.905) 5(2.712,-1.905) 6(2.712,-0.635) 7(2.712,0.635) 8(2.712,1.905)
  silkscreen extent -3.47,-2.45 1.6,2.58, body extent -3,-2.45 3,2.45, height 1.75
SOIC127P950X590-16N [mm]
  rect 1.75x0.7 smd: 1(-4.375,4.445) 2(-4.375,3.175) 3(-4.375,1.905) 4(-4.375,0.635) 5(-4.375,-0.635) 6(-4.375,-1.905) 7(-4.375,-3.175) 8(-4.375,-4.445) 9(4.375,-4.445) 10(4.375,-3.175) 11(4.375,-1.905) 12(4.375,-0.635) 13(4.375,0.635) 14(4.375,1.905) 15(4.375,3.175) 16(4.375,4.445)
  silkscreen extent -5.25,-6.4 3.15,6.4, body extent -4.75,-6.4 4.75,6.4, height 5.9
SOIC127P1030X265-16N [mm]
  rect 1.87x0.65 smd: 1(-4.69,4.445) 2(-4.69,3.175) 3(-4.69,1.905) 4(-4.69,0.635) 5(-4.69,-0.635) 6(-4.69,-1.905) 7(-4.69,-3.175) 8(-4.69,-4.445) 9(4.69,-4.445) 10(4.69,-3.175) 11(4.69,-1.905) 12(4.69,-0.635) 13(4.69,0.635) 14(4.69,1.905) 15(4.69,3.175) 16(4.69,4.445)
  silkscreen extent -5.63,-5.15 3.4,5.15
"TDN 5WISM SINGLE_TRP" [mm]
  rect 5.69x1.397 smd paste-0.699 mask+0: 1(4.75,3) 2(4.75,1) 4(4.75,-3) 5(-4.75,3) 6(-4.75,1) 7(-4.75,-1)
  silkscreen extent -11.67,-4.67 6.73,4.67, body extent -6.6,-4.55 6.6,4.55, height 10.21
testpoint [mm]
  round 1.5 smd: 1(0,0)
WL-SMCW_0603_150060xx75000 [mm] "SMD Mono-color Chip LED, body 1.60 x 0.80 mm"
  rect 0.8x0.8 smd: 1(-0.8,0) 2(0.8,0)
  silkscreen extent -1.55,-0.4 -1.4,0.4, body extent -0.8,-0.4 0.8,0.4, height 0.7
ZED-F9P [mm] "Multi-band GNSS receiver"
  rect 0.8x1.5 smd paste-2: 1(-7.15,-7.45) 2(-6.05,-7.45) 3(-4.95,-7.45) 4(-3.85,-7.45) 5(-2.75,-7.45) 6(-1.65,-7.45) 7(-0.55,-7.45) 8(0.55,-7.45) 9(1.65,-7.45) 10(2.75,-7.45) 11(3.85,-7.45) 12(4.95,-7.45) 13(6.05,-7.45) 14(7.15,-7.45) 28(7.15,7.45) 29(6.05,7.45) 30(4.95,7.45) 31(3.85,7.45) 32(2.75,7.45) 33(1.65,7.45) 34(0.55,7.45) 35(-0.55,7.45) 36(-1.65,7.45) 37(-2.75,7.45) 38(-3.85,7.45) 39(-4.95,7.45) 40(-6.05,7.45) 41(-7.15,7.45)
  rect 1.5x0.8 smd paste-2: 15(9.95,-6.6) 16(9.95,-5.5) 17(9.95,-4.4) 18(9.95,-3.3) 19(9.95,-2.2) 20(9.95,-1.1) 21(9.95,0) 22(9.95,1.1) 23(9.95,2.2) 24(9.95,3.3) 25(9.95,4.4) 26(9.95,5.5) 27(9.95,6.6) 42(-9.95,6.6) 43(-9.95,5.5) 44(-9.95,4.4) 45(-9.95,3.3) 46(-9.95,2.2) 47(-9.95,1.1) 48(-9.95,0) 49(-9.95,-1.1) 50(-9.95,-2.2) 51(-9.95,-3.3) 52(-9.95,-4.4) 53(-9.95,-5.5) 54(-9.95,-6.6)
  rect 1.1x1.1 smd paste-2: 55(-7.35,5.25) 55(-7.35,-3.15) 55(-7.35,-1.05) 55(-7.35,1.05) 55(-7.35,3.15) 55(-7.35,-5.25) 55(-5.25,3.15) 55(-5.25,5.25) 55(-5.25,-1.05) 55(-5.25,1.05) 55(-5.25,-5.25) 55(-5.25,-3.15) 55(-3.15,5.25) 55(-3.15,3.15) 55(-3.15,1.05) 55(-3.15,-1.05) 55(-3.15,-3.15) 55(-3.15,-5.25) 55(-1.05,5.25) 55(-1.05,3.15) 55(-1.05,1.05) 55(-1.05,-1.05) 55(-1.05,-3.15) 55(-1.05,-5.25) 55(1.05,5.25) 55(1.05,3.15) 55(1.05,1.05) 55(1.05,-1.05) 55(1.05,-3.15) 55(1.05,-5.25) 55(3.15,5.25) 55(3.15,3.15) 55(3.15,1.05) 55(3.15,-1.05) 55(3.15,-3.15) 55(3.15,-5.25) 55(5.25,3.15) 55(5.25,5.25) 55(5.25,-1.05) 55(5.25,1.05) 55(5.25,-5.25) 55(5.25,-3.15) 55(7.35,5.25) 55(7.35,-3.15) 55(7.35,-1.05) 55(7.35,1.05) 55(7.35,3.15) 55(7.35,-5.25)
  silkscreen extent -11,-9.57 11,8.5, body extent -11,-8.5 11,8.5, height 2.49